# Altium PCB B-60-30-B.PcbDoc (part 1 of 3)
Units mm, origin at the board's own origin, x right, y up, seen from the top; angles counter-clockwise.
Board outline 70.1 x 39.1 mm, 6 copper layers (Top Layer, G1, S1, S2, G2, Bottom Layer), stack 2.011 mm thick; 241 components, 129 nets, 632 pads, 875 vias.
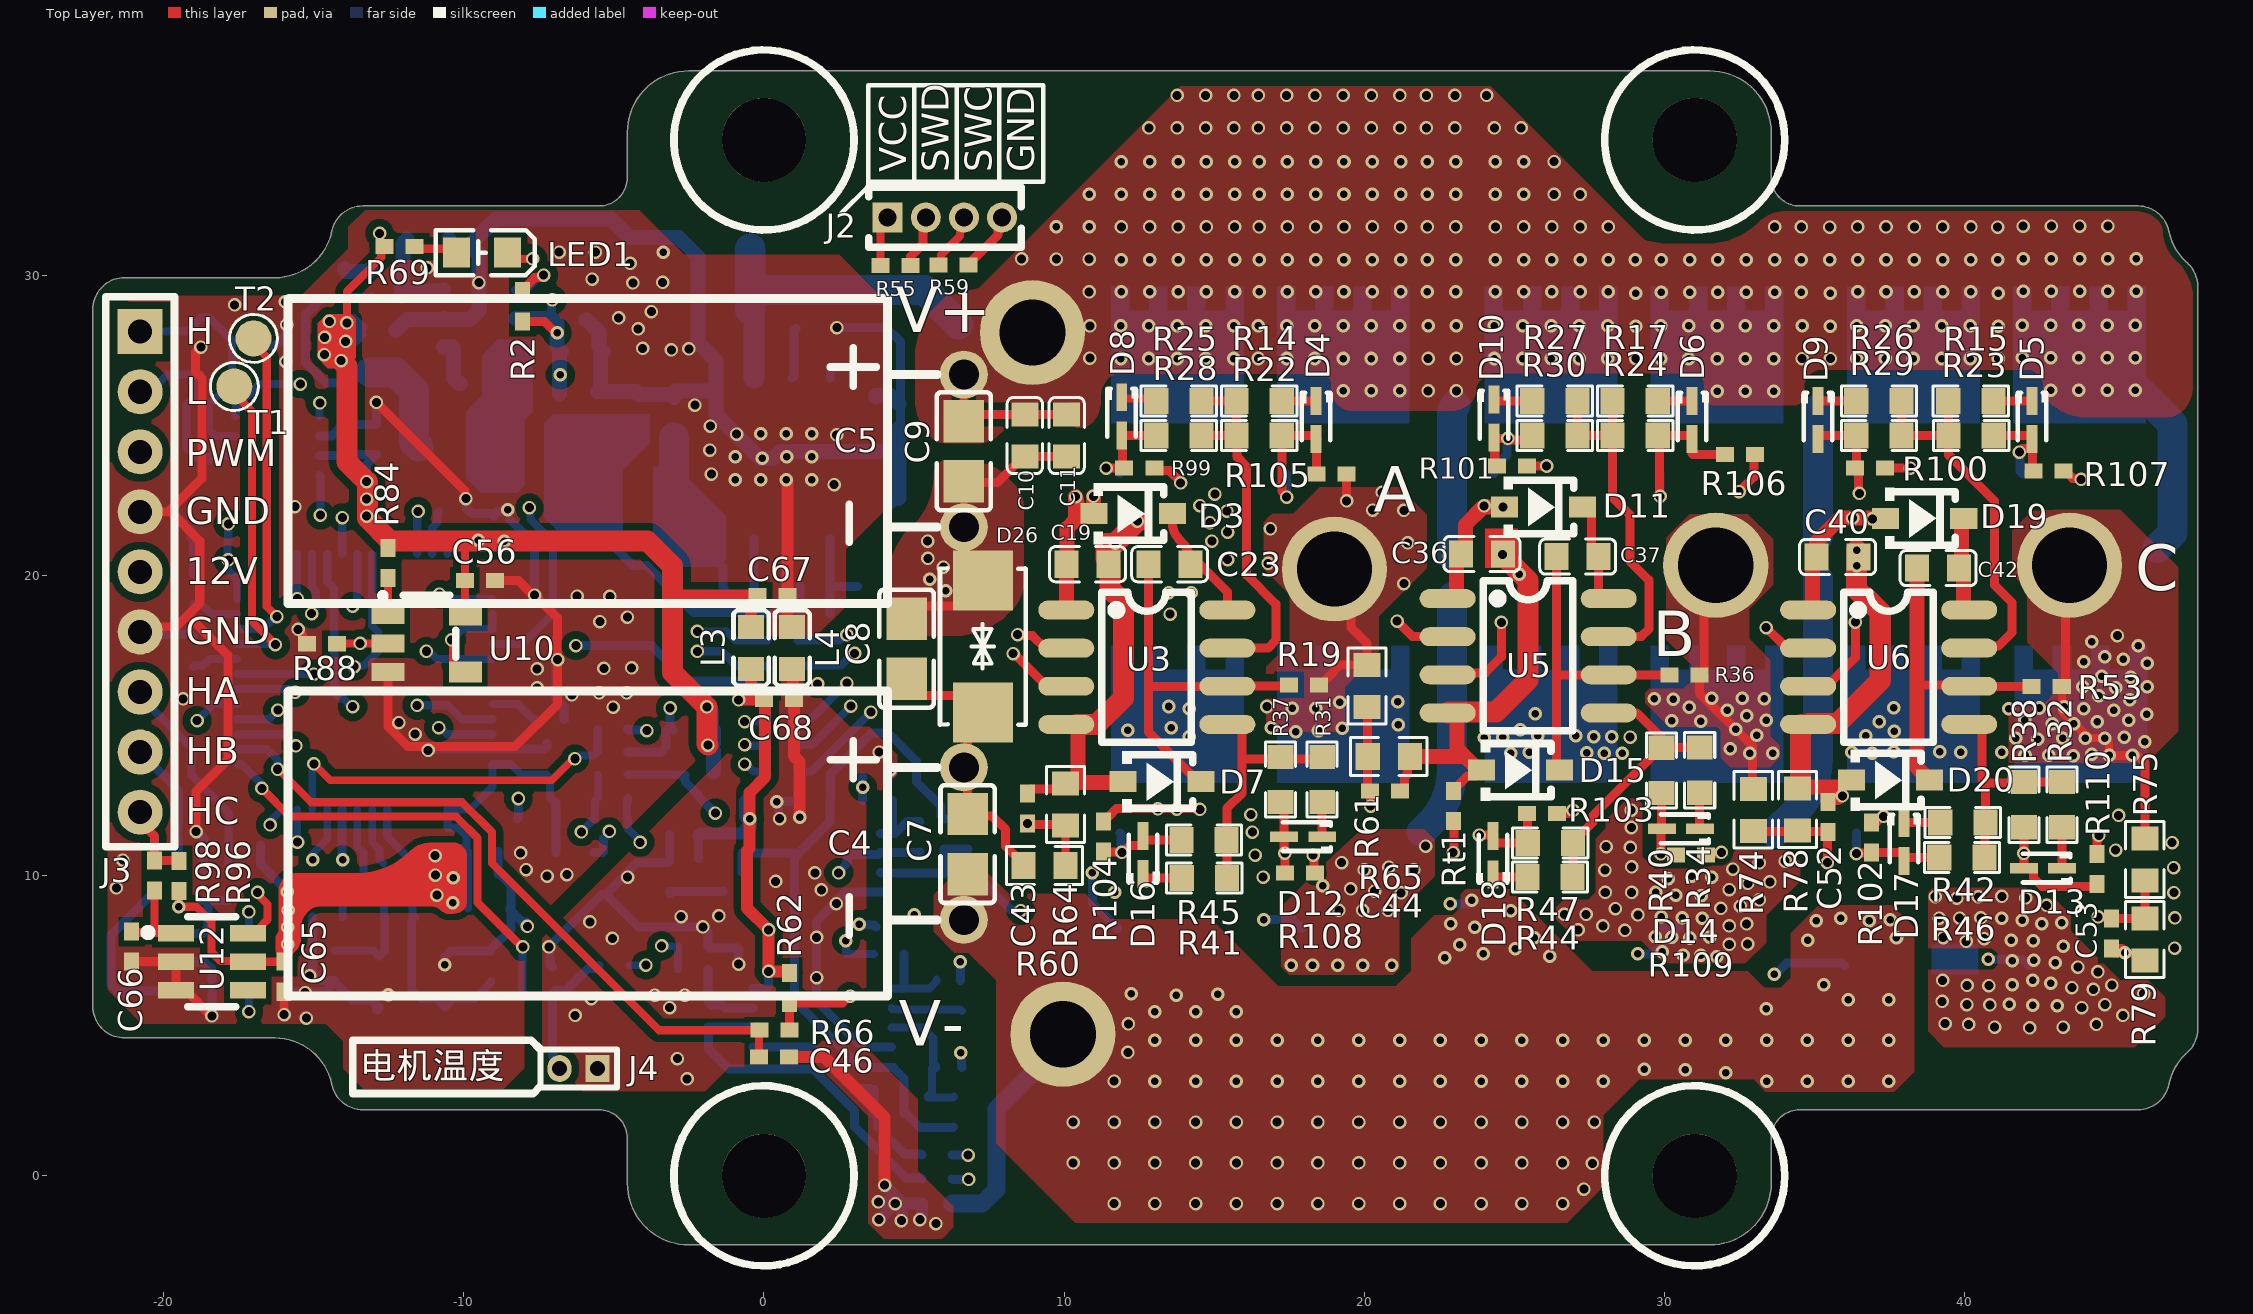
[diagram p0: Top Layer view]
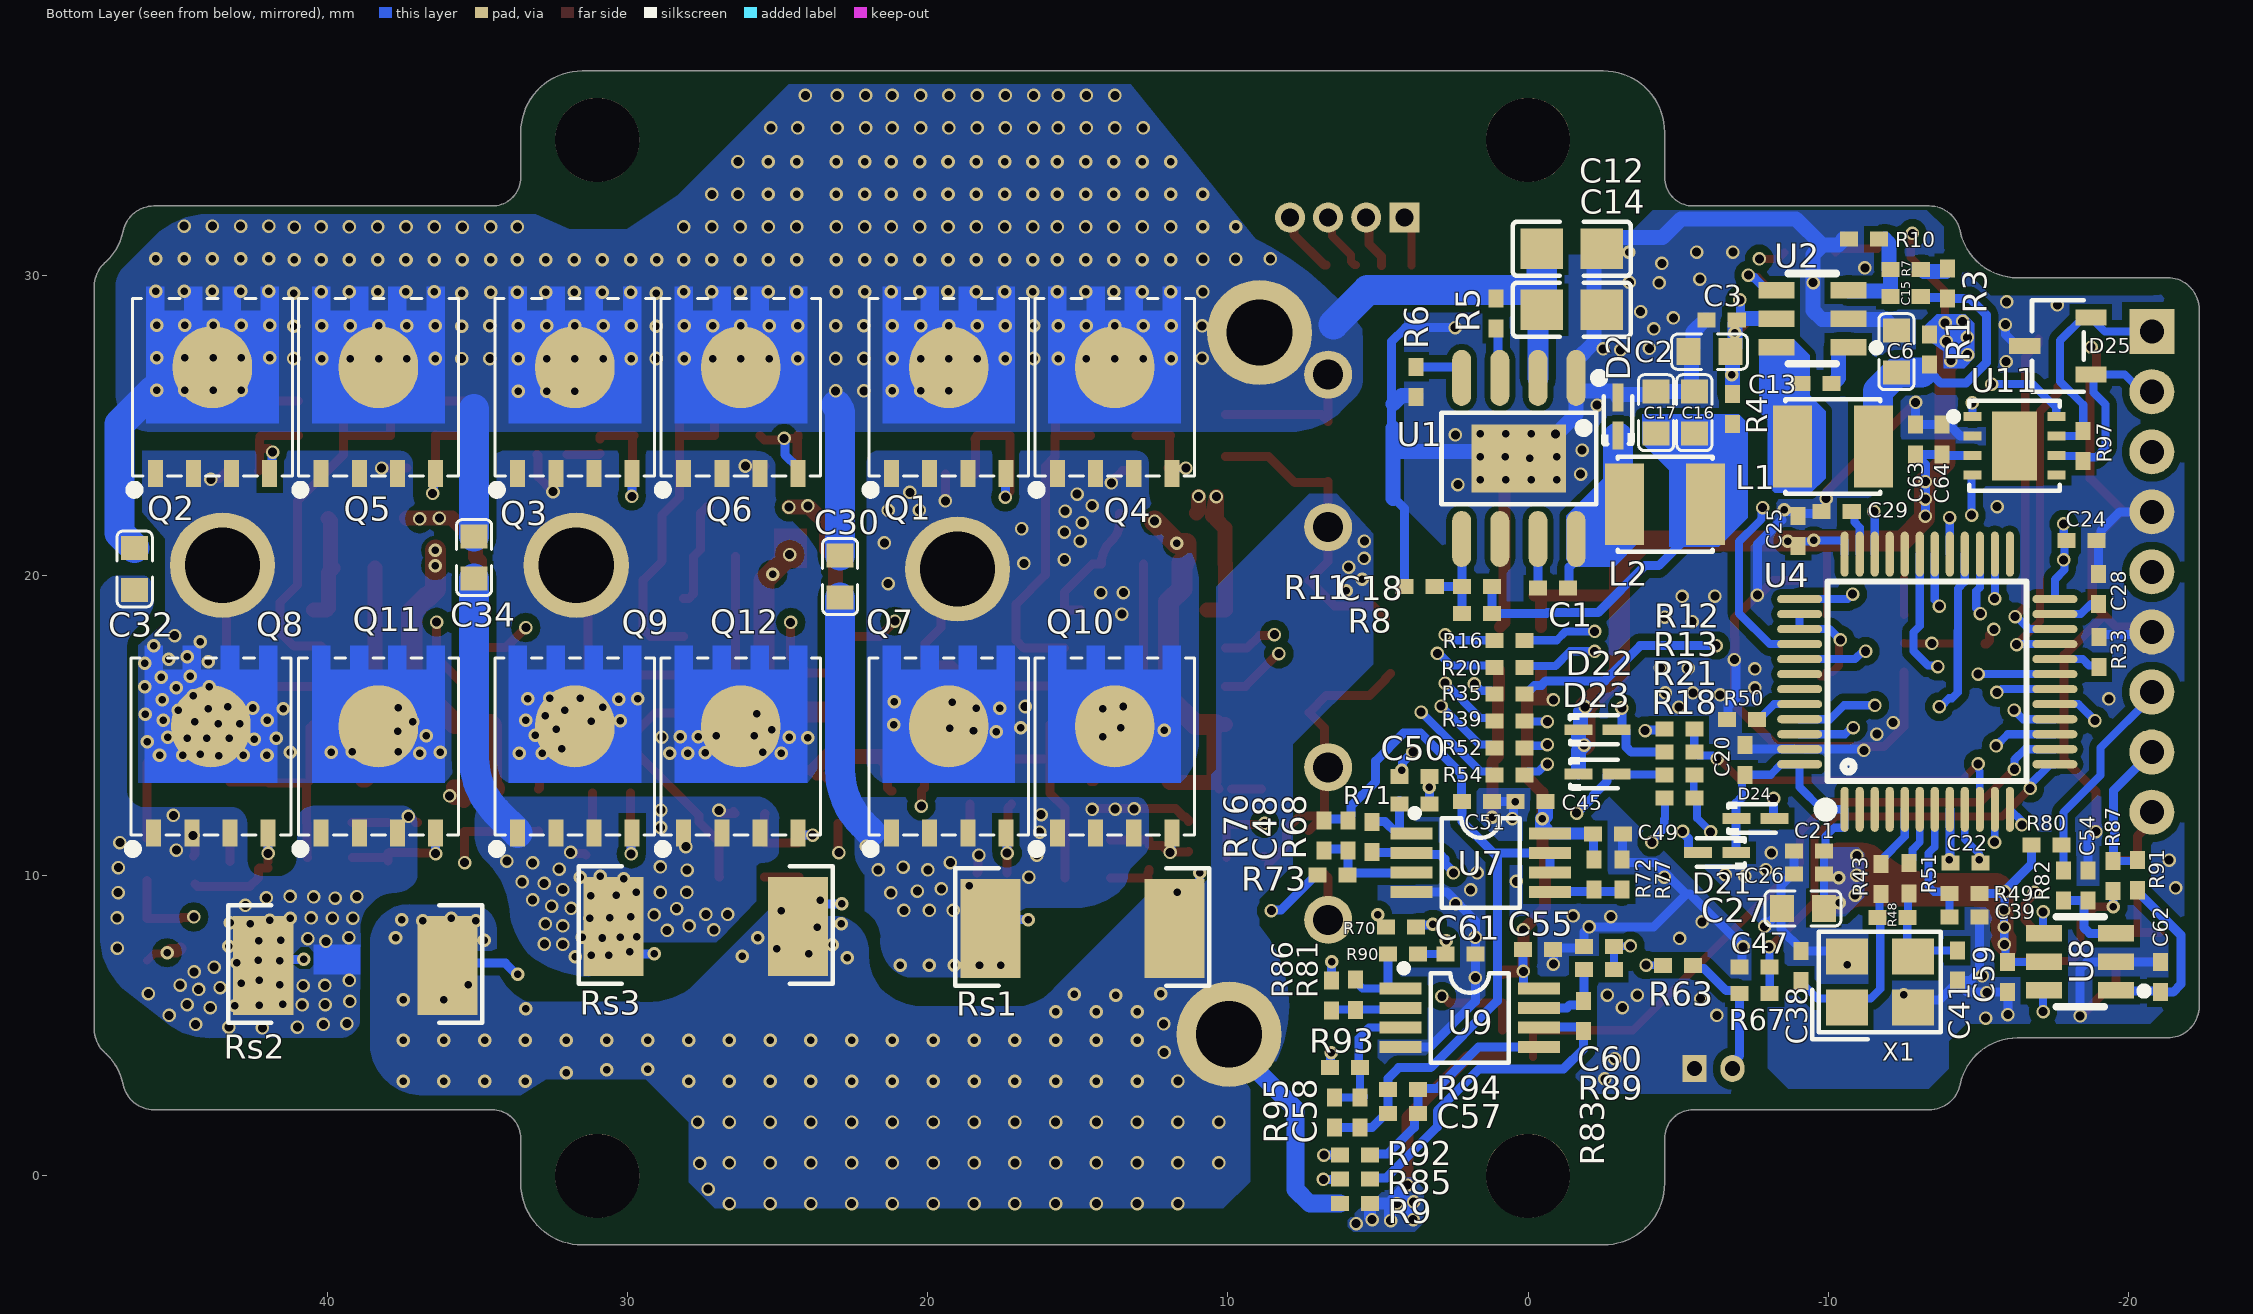
[diagram p1: Bottom Layer view, seen from below]
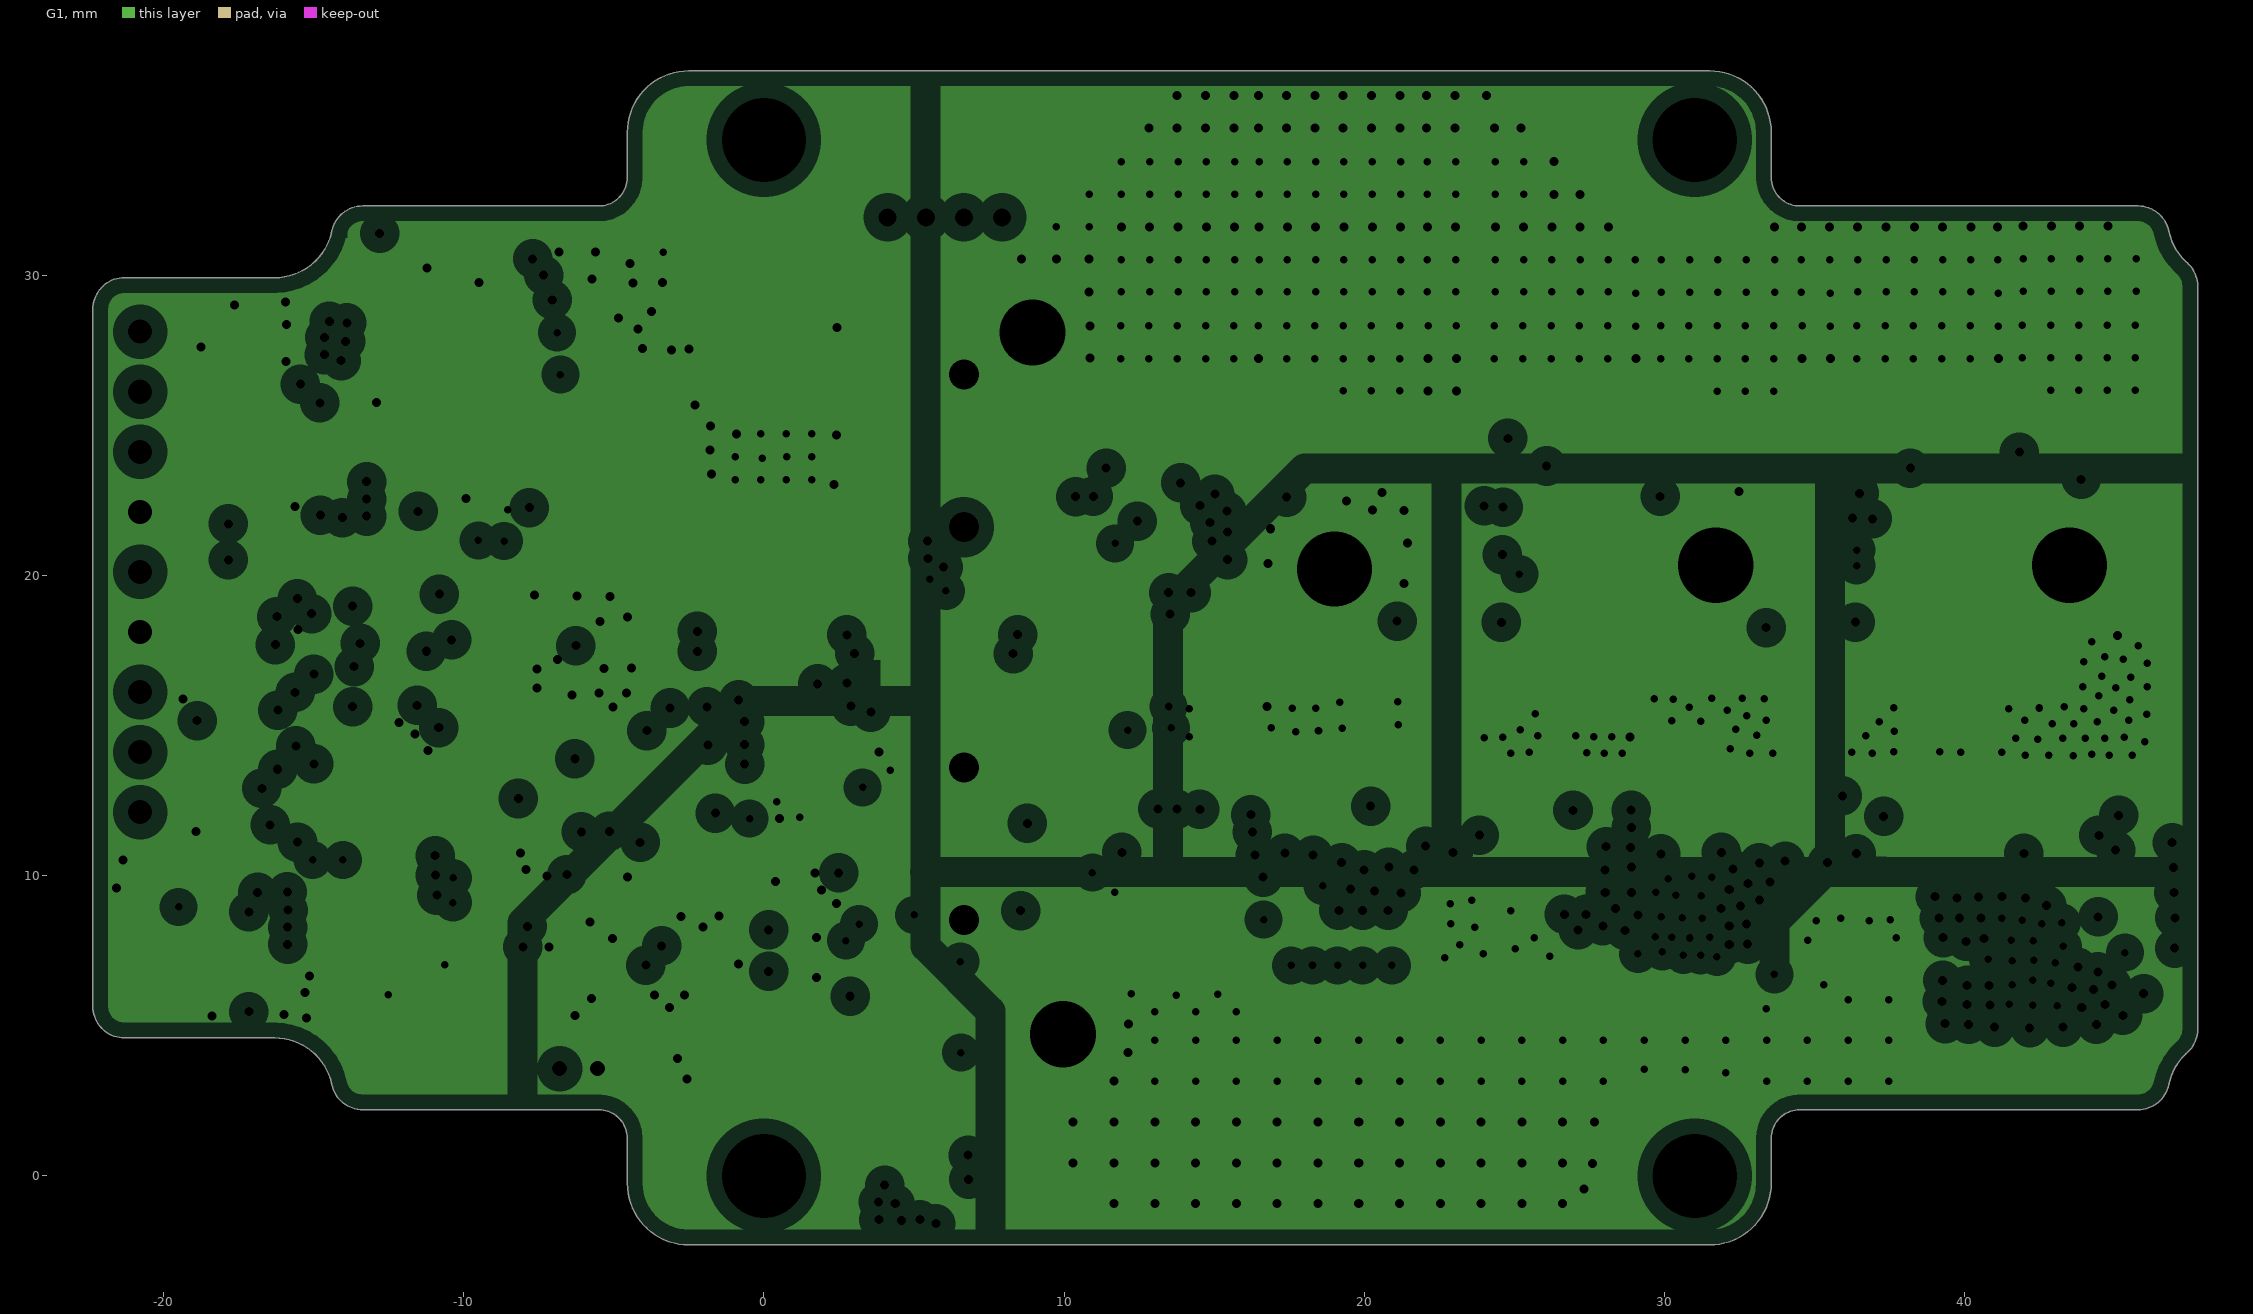
[diagram p2: G1, clearances drawn from the general rule]
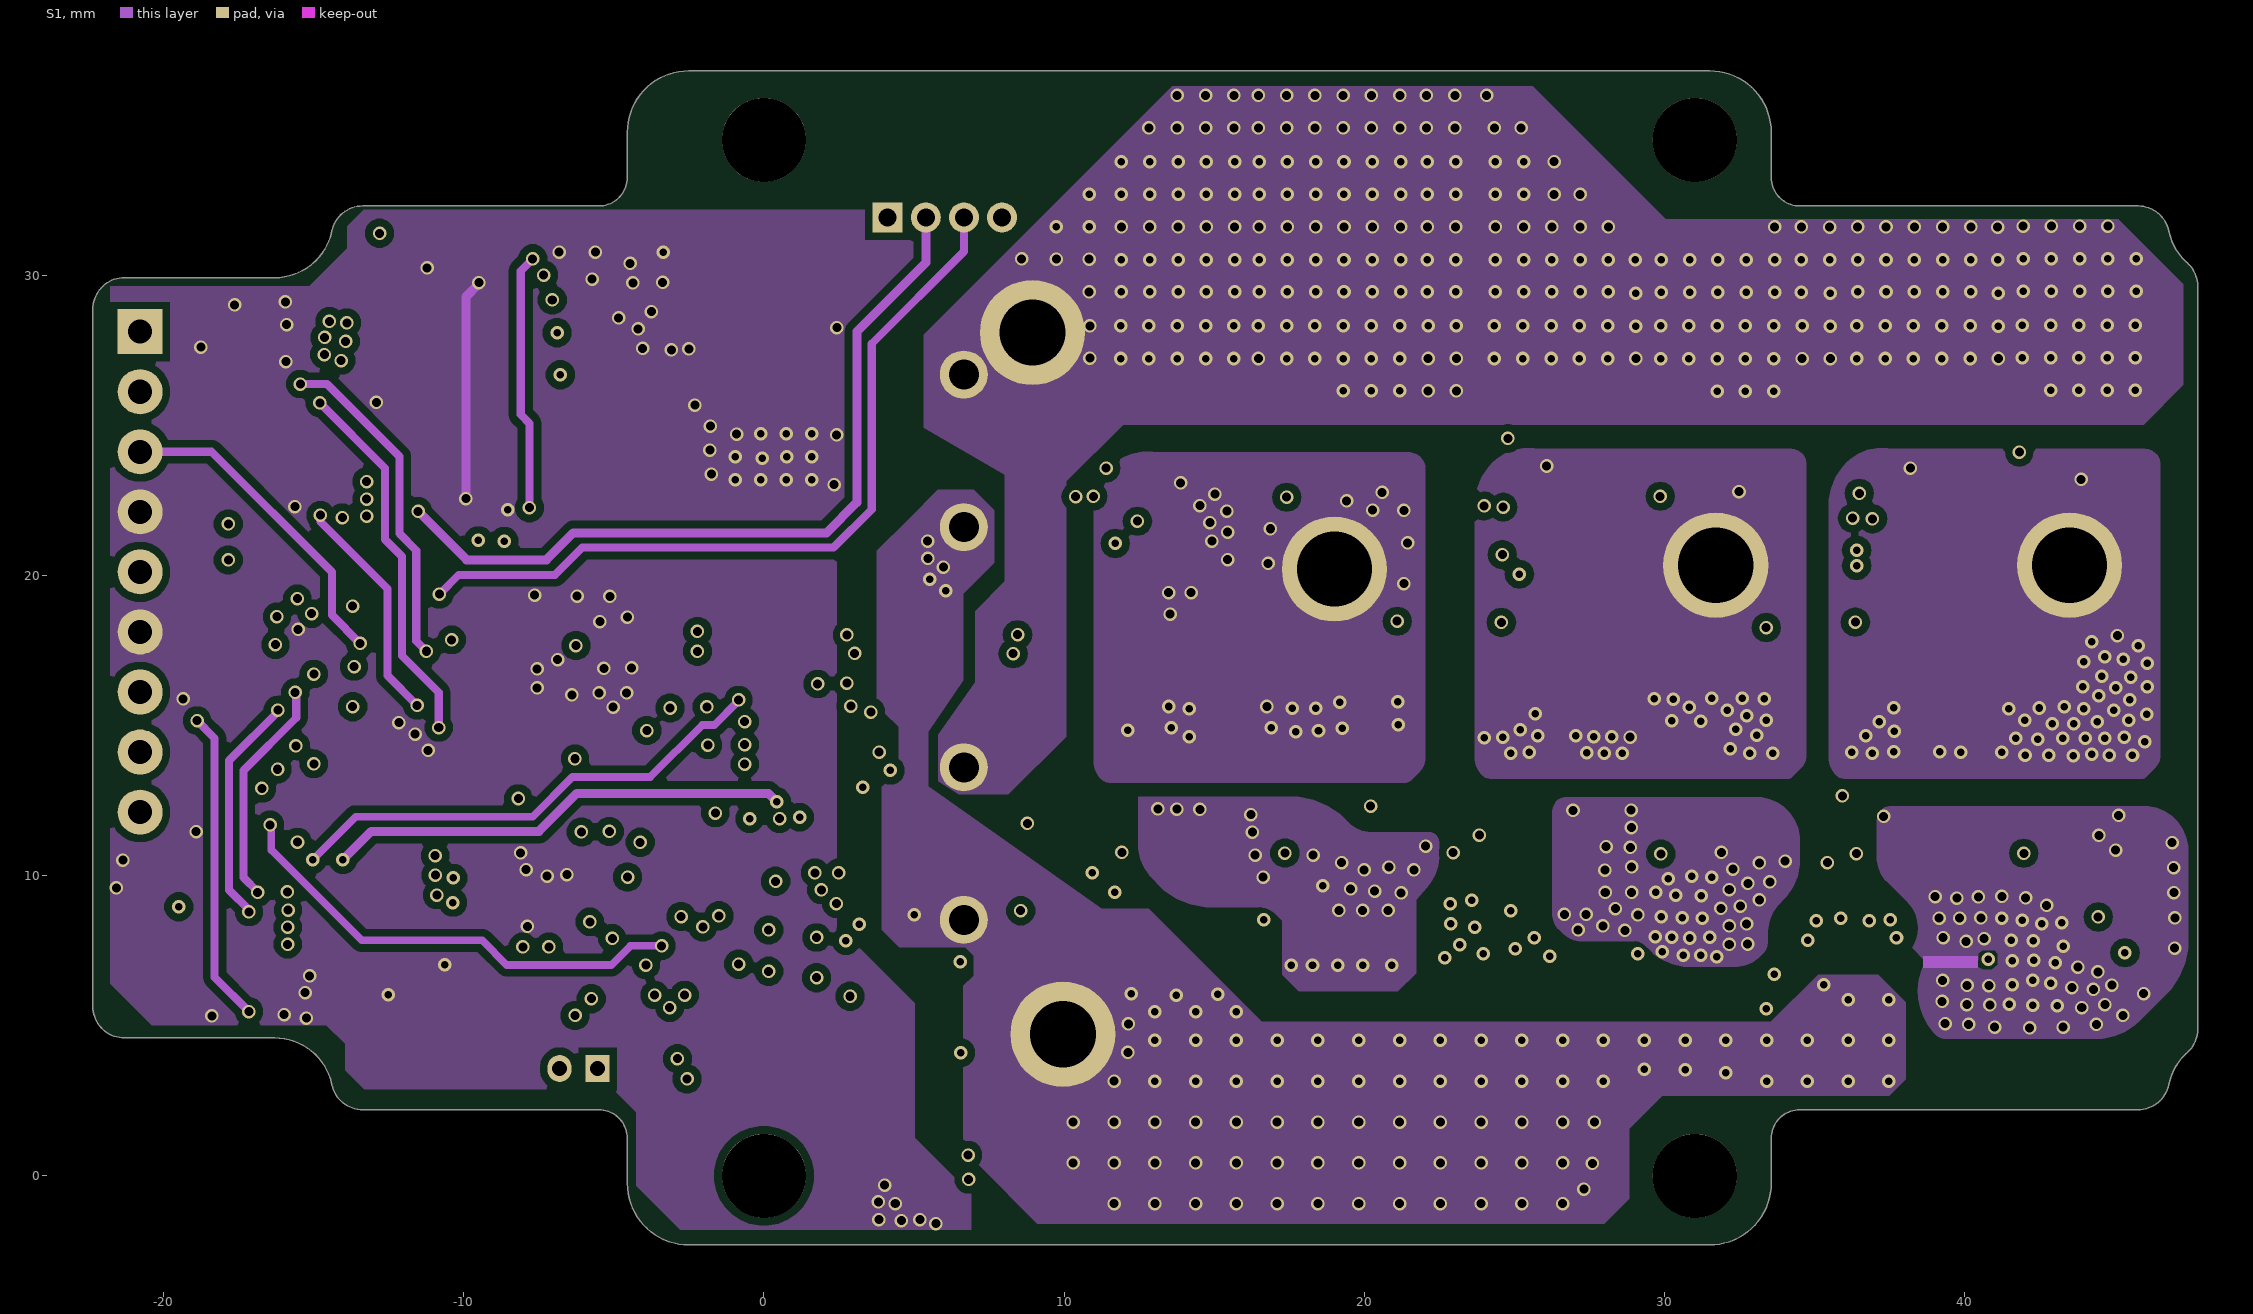
[diagram p3: S1]
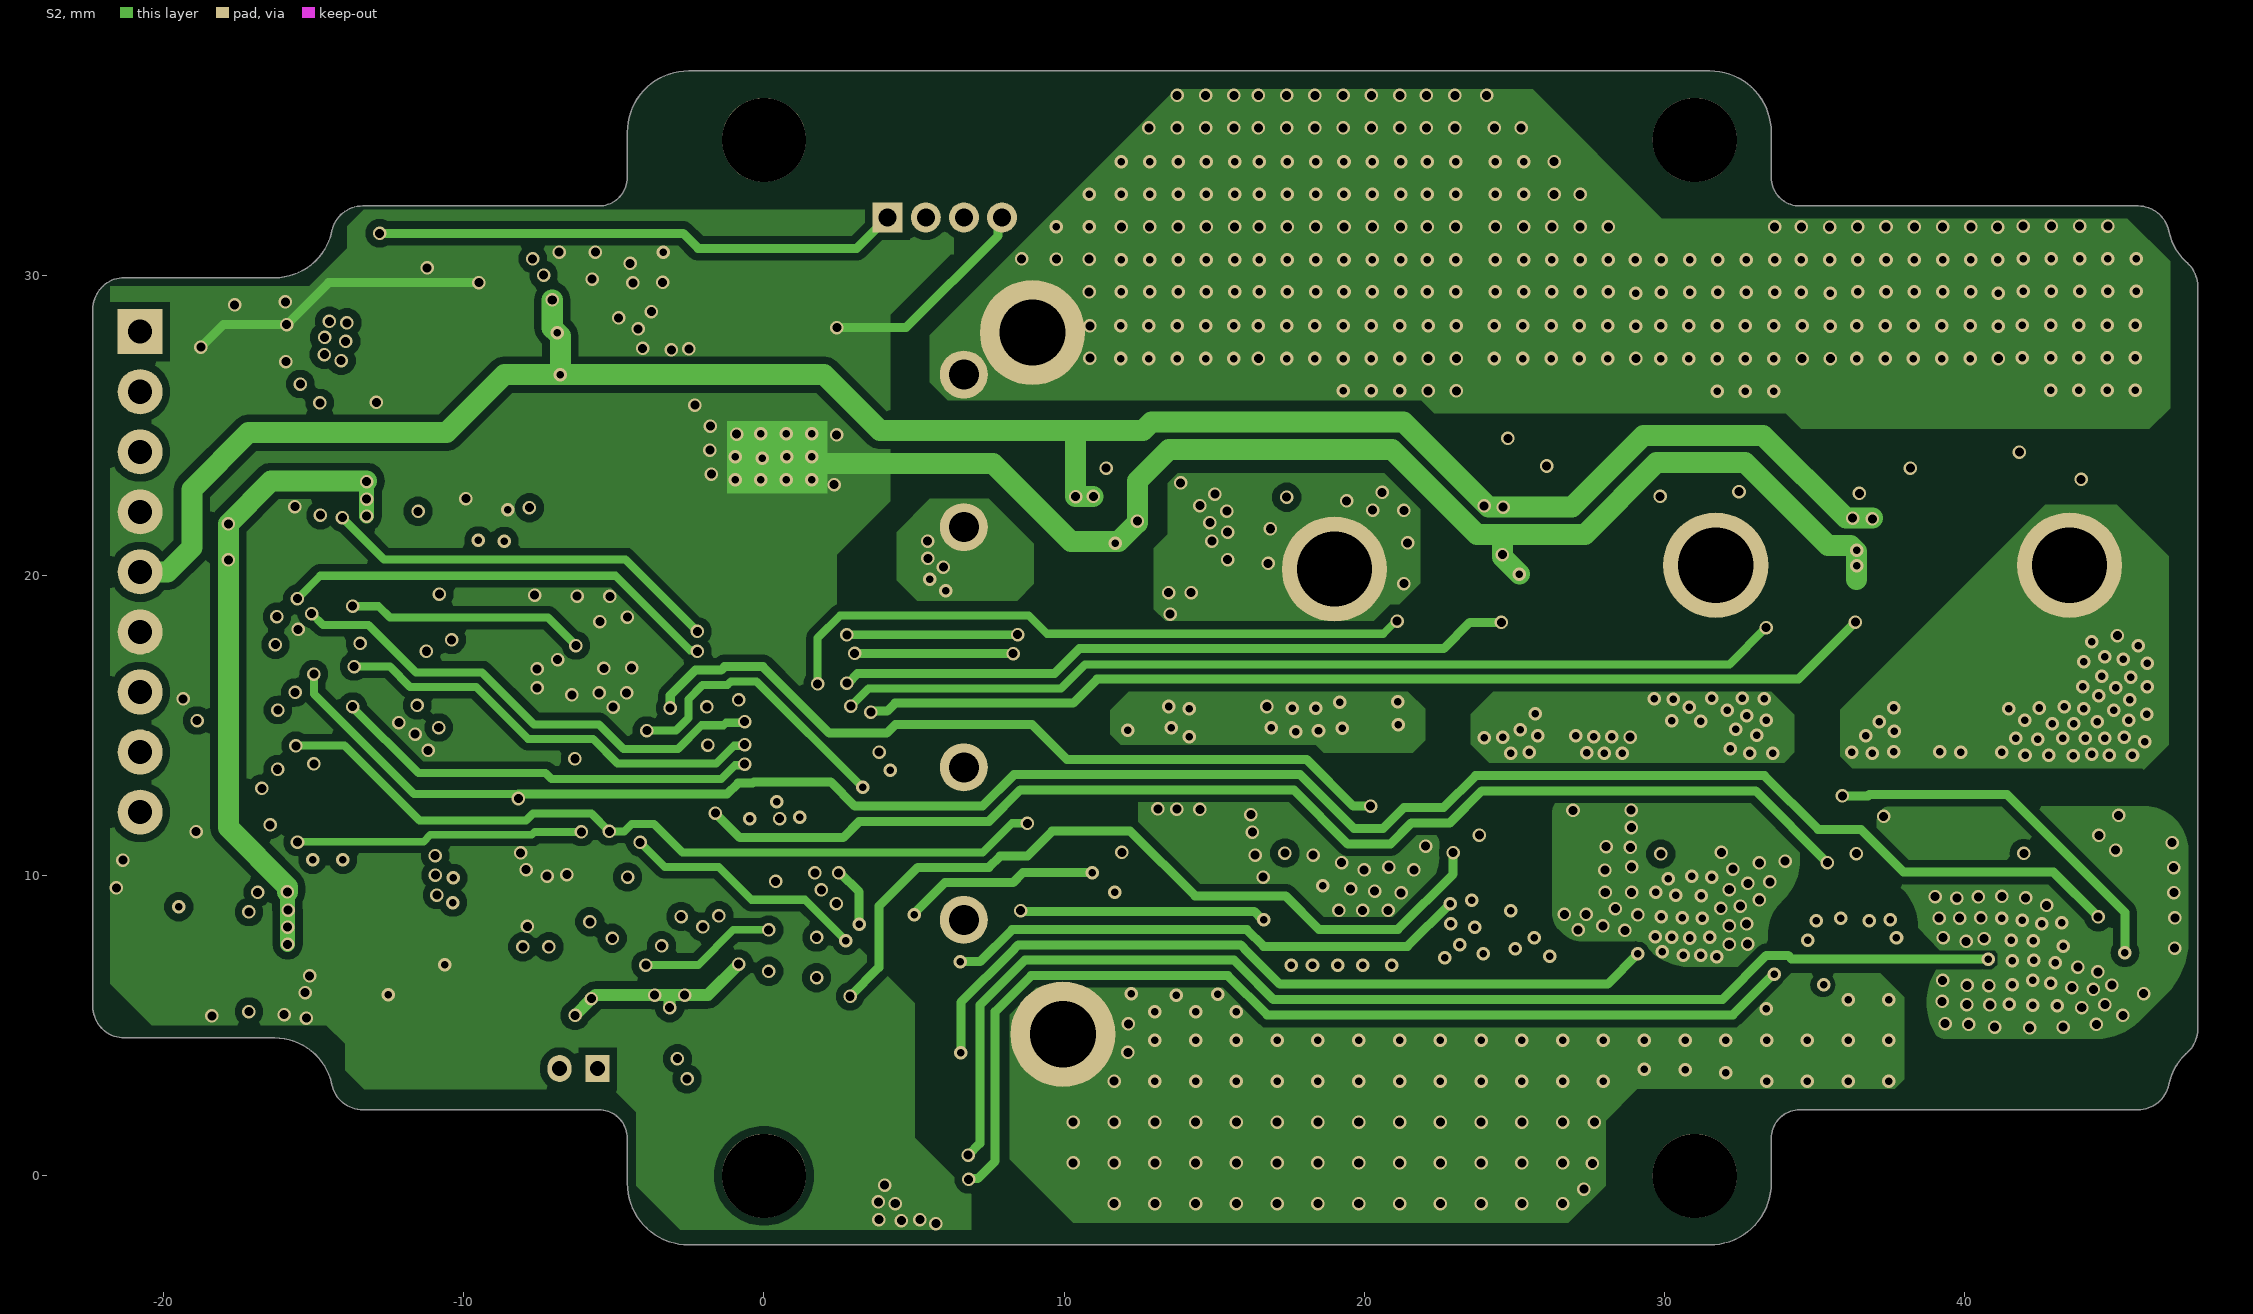
[diagram p4: S2]
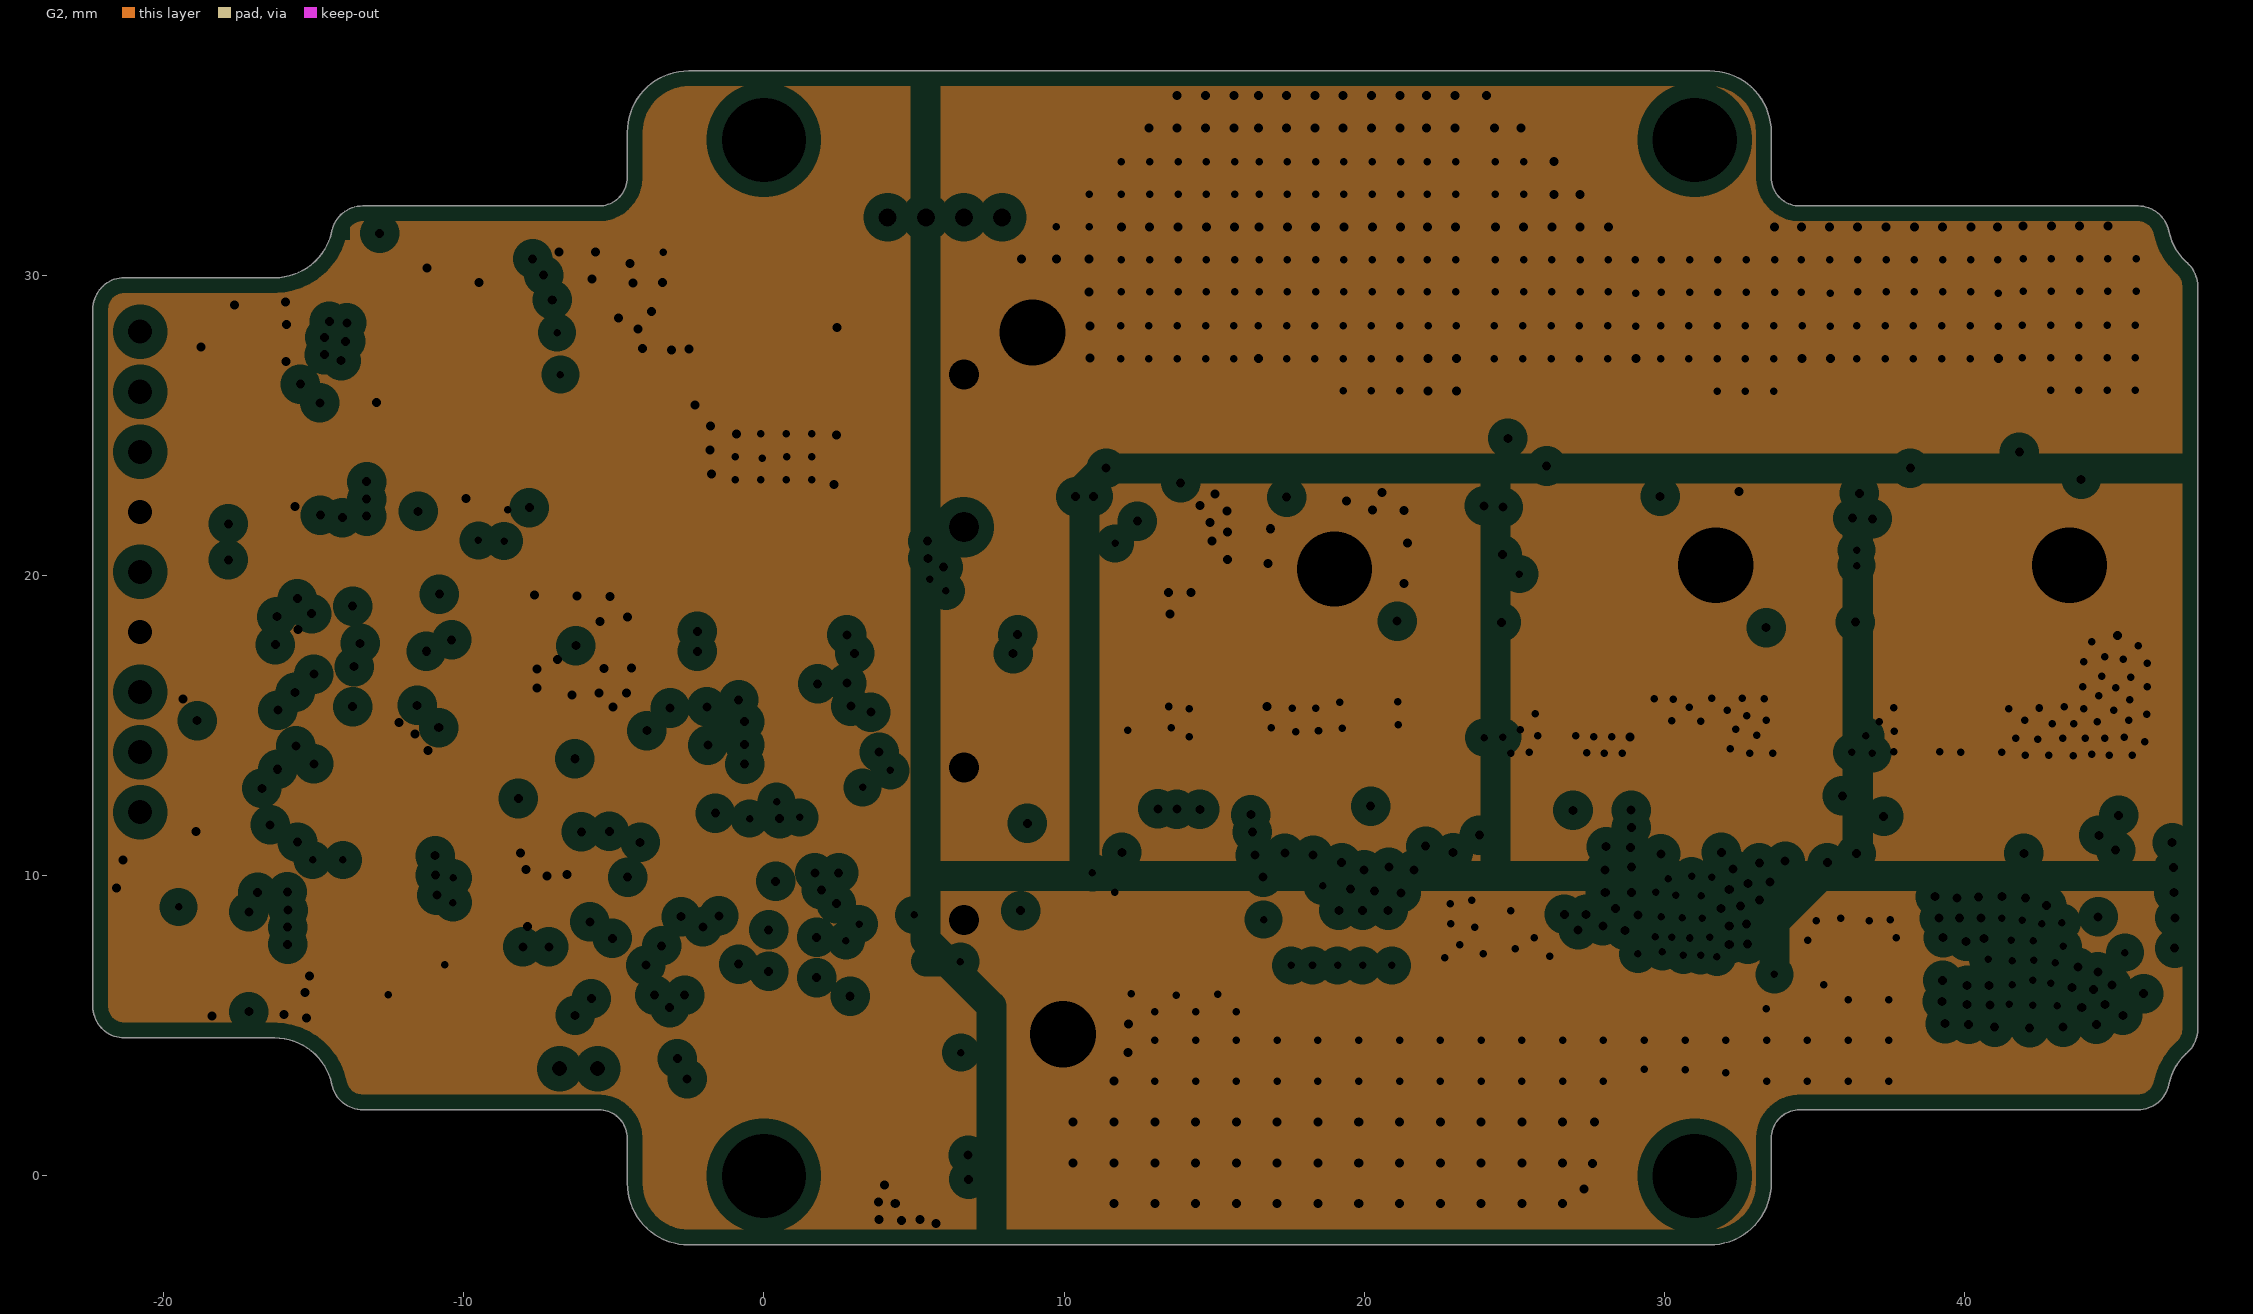
[diagram p5: G2, clearances drawn from the general rule]

## Layer stack, top to bottom
Top Solder: solder mask 0.0102, Solder Resist, Dk 3.5
Top Layer: signal copper 0.0356
Dielectric 2: prepreg 0.2, PP-006, Dk 4.1
G1: plane copper 0.035, net (Multiple Nets)
Dielectric 4: prepreg 0.3, PP-006, Dk 4.1
S1: signal copper 0.035
Dielectric 1: dielectric 0.8, FR-4, Dk 4.8
S2: signal copper 0.035
Dielectric 5: prepreg 0.3, PP-006, Dk 4.1
G2: plane copper 0.035, net (Multiple Nets)
Dielectric 3: prepreg 0.2, PP-006, Dk 4.1
Bottom Layer: signal copper 0.0356
Bottom Solder: solder mask 0.0102, Solder Resist, Dk 3.5

## Board outline
-21.3,4.593 -16.3,4.593 cw(c-16.3,2.642) -14.39,3.041 ccw(c-14.341,3.051) -14.388,3.032 ccw(c-13.362,3.248) -13.36,2.199 ccw(c-13.36,2.25) -13.356,2.2 -5.5,2.2 cw(c-5.5,1.25) -4.55,1.25 -4.55,-0.25 ccw(c-2.5,-0.25) -2.5,-2.3 ccw(c-2.5,-2.25) -2.499,-2.3 31.5,-2.3 ccw(c31.5,-0.25) 33.55,-0.25 33.55,1.25 cw(c34.5,1.25) 34.5,2.2 45.756,2.2 ccw(c45.76,2.25) 45.76,2.199 ccw(c45.762,3.248) 46.789,3.04 cw(c48.7,2.649) 47.353,4.059 ccw(c47.328,4.103) 47.36,4.064 ccw(c46.7,4.88) 47.749,4.87 ccw(c47.7,4.88) 47.75,4.88 47.75,29.628 ccw(c47.7,29.628) 47.749,29.638 ccw(c46.7,29.628) 47.36,30.444 ccw(c47.328,30.405) 47.358,30.445 cw(c48.7,31.861) 46.79,31.463 ccw(c45.763,31.251) 45.766,32.3 ccw(c45.762,32.25) 45.762,32.3 34.5,32.3 cw(c34.5,33.25) 33.55,33.25 33.55,34.75 ccw(c31.5,34.75) 31.5,36.8 -2.499,36.8 ccw(c-2.5,36.75) -2.5,36.8 ccw(c-2.5,34.75) -4.55,34.75 -4.55,33.25 cw(c-5.5,33.25) -5.5,32.3 ccw(c-5.5,32.25) -5.504,32.3 -13.362,32.3 ccw(c-13.363,31.251) -14.39,31.463 ccw(c-14.341,31.453) -14.39,31.463 ccw(c-16.3,31.861) -14.39,31.463 cw(c-16.3,31.861) -16.3,29.91 -21.3,29.91 ccw(c-21.3,28.86) -22.35,28.86 -22.35,5.644 ccw(c-21.3,5.644)

## Design rules (kind name [scope] priority, off if disabled: settings)
Clearance [All] p1: gap=0.254 ignorepadtopadclearanceinfootprint=TRUE except(0: Arc-Hole Track-Hole THPad-Hole Via-Hole Fill-Hole Poly-Hole Region-Hole Text-Hole; 0.2: Arc-SMDPad Track-SMDPad SMDPad-SMDPad SMDPad-THPad SMDPad-Via SMDPad-Fill SMDPad-Poly SMDPad-Text SMDPad-Hole Via-Via; 0.21: Arc-Arc Arc-Track Track-Track; 0.22: Arc-Region Track-Region SMDPad-Region THPad-Region Via-Region Fill-Region Poly-Region Region-Region)
ComponentClearance [All] p1: gap=0 collisioncheckmode=3 verticalgap=0 showdistances=FALSE
HoleSize [All] p1: absolutevalues=TRUE maxlimit=2.8 minlimit=0.025 maxpercent=80.000 minpercent=20.000
MinimumSolderMaskSliver [All] p1: minsoldermaskwidth=0
PlaneClearance [All] p1: clearance=0.508
PlaneConnect [All] p1: planeconnectstyle=Direct reliefexpansion=0.508 reliefentries=4 reliefconductorwidth=0.254 reliefairgap=0.254
PolygonConnect PolygonConnect_1 [InNet('GND') vs InNet('3V3')] p1: thpad.connectstyle=Relief thpad.reliefconductorwidth=0.4 thpad.reliefentries=4 thpad.polygonreliefangle="90 Angle" thpad.airgapwidth=0.254 smdpad.connectstyle=Relief smdpad.reliefconductorwidth=0.4 smdpad.reliefentries=4 smdpad.polygonreliefangle="90 Angle" smdpad.airgapwidth=0.254 via.connectstyle=Direct via.reliefconductorwidth=0.254 via.reliefentries=4 via.polygonreliefangle="90 Angle" via.airgapwidth=0.254
PolygonConnect [All] p2: connectstyle=Direct reliefconductorwidth=0.254 reliefentries=4 polygonreliefangle="90 Angle" airgapwidth=0.254
RoutingVias [All] p1: holewidth=0.3 width=0.45 viastyle="Through Hole" minholewidth=0.25 minwidth=0.45 maxholewidth=0.3 maxwidth=0.45
SilkToSilkClearance [All] p1: silktosilkclearance=0
SilkToSolderMaskClearance [IsPad] p1: minsilkscreentomaskgap=0 clearancetoexposedcopper=TRUE
SolderMaskExpansion [All] p1: expansion=0.102
Width [All] p1: maxlimit=1.5 minlimit=0.254 preferedwidth=0.3
23 further rules are at their usual default settings.

## Components (designator, comment, footprint, x,y, rotation, side; value= is the part's Value field where it differs from the comment)
A "THT_TEST_POINT" Hole-3MM#1 19.356,20.208 r0 top
B "THT_TEST_POINT" Hole-3MM#1 32.056,20.335 r0 top
C "THT_TEST_POINT" Hole-3MM#2 43.486,20.335 r0 top
C1 "103/50V/0402" 0402 -0.837,19.573 r0 bottom value=104/100V/0603
C2 "475/25V/0603" C0603 -6.044,27.447 r0 bottom value=0.1uF
C3 "104/50V/0402" 0402 -6.45,28.51 r0 bottom value=0.1uF
C4 "100uF/100V/10X12.5" CAP-TH_10X20 6.656,11.064 r270 top locked value=100uF
C5 "100uF/100V/10X12.5" CAP-TH_10X20 6.656,24.145 r270 top locked value=100uF
C6 "475/25V/0603" C0603 -12.267,27.447 r90 bottom value=0.1uF
C7 "475/100V/0805" C0805 6.783,10.048 r90 top value=475/100V/1210
C8 "475/100V/0805" C0805 4.751,18.557 r270 top value=475/100V/1210
C9 "475/100V/0805" C0805 6.656,23.129 r90 top value=475/100V/1210
C10 "104/100V/0603" C0603 8.688,24.653 r270 top value=226/25V/0805
C11 "104/100V/0603" C0603 10.085,24.653 r270 top value=226/25V/0805
C12 "475/100V/0805" C0805 -2.456,30.876 r0 bottom value=475/100V/1210
C13 "104/50V/0402" 0402 -9.61,26.39 r180 bottom value=104/100V/0603
C14 "475/100V/0805" C0805 -2.456,28.844 r0 bottom value=475/100V/1210
C15 "100pF/25V/0402" 0402 -12.578,29.288 r0 bottom value=106/25V/0603
C16 "106/25V/0603" C0603 -5.536,25.415 r90 bottom value=226/25V/0805
C17 "106/25V/0603" C0603 -4.266,25.415 r90 bottom value=226/25V/0805
C18 "100pF/25V/0402" 0402 1.703,19.62 r0 bottom value=106/25V/0603
C19 "106/25V/0603" C0603 10.782,20.368 r0 top value=226/25V/0805
C20 "104/50V/0402" 0402 -7.22,13.85 r270 bottom value=104/100V/0603
C21 "104/50V/0402" 0402 -9.354,10.81 r180 bottom value=104/100V/0603
C22 "104/50V/0402" 0402 -14.57,10.41 r0 bottom value=104/100V/0603
C23 "225/50V/0603" C0603 13.514,20.368 r180 top
C24 "104/50V/0402" 0402 -18.43,21.16 r180 bottom value=104/100V/0603
C25 "104/50V/0402" 0402 -8.992,21.478 r90 bottom value=104/100V/0603
C26 "104/50V/0402" 0402 -9.354,10.048 r0 bottom
C27 "106/25V/0603" C0603 -9.154,8.905 r0 bottom
C28 "475/10V/0402" 0402 -19,19.55 r90 bottom
C29 "475/10V/0402" 0402 -10.28,22.13 r0 bottom
C30 "103/100V/0603" C0603 22.912,19.954 r270 bottom value=226/25V/0805
C32 "103/100V/0603" C0603 46.407,20.208 r270 bottom value=226/25V/0805
C34 "103/100V/0603" C0603 35.104,20.589 r270 bottom value=226/25V/0805
C36 "106/25V/0603" C0603 23.91,20.71 r0 top value=226/25V/0805
C37 "225/50V/0603" C0603 27.103,20.622 r180 top
C38 "18pF/25V/0402" 0402 -9.092,6.992 r270 bottom value=106/25V/0603
C39 "475/10V/0402" 0402 -14.542,8.625 r0 bottom
C40 "106/25V/0603" C0603 35.76,20.61 r0 top value=226/25V/0805
C41 "18pF/25V/0402" 0402 -14.299,7 r90 bottom value=106/25V/0603
C42 "225/50V/0603" C0603 39.106,20.241 r180 top
C43 "103/50V/0402" 0402 8.776,12.24 r270 top
C44 "103/50V/0402" 0402 20.69,12.82 r180 top
C45 "225/16V/0402" 0402 -0.075,12.461 r0 bottom
C46 "103/50V/0402" 0402 0.338,3.96 r180 top
C47 "103/50V/0402" 0402 -7.548,6.956 r180 bottom
C48 "221/50V/0402" 0402 6,11.34 r270 bottom
C49 "104/50V/0402" 0402 -2.66,11.39 r180 bottom
C50 "221/50V/0402" 0402 3.79,13.3 r180 bottom
C51 "104/50V/0402" 0402 1.703,12.461 r180 bottom
C52 "103/50V/0402" 0402 35.44,11.95 r270 top
C53 "103/50V/0402" 0402 44.88,8.07 r90 top
C54 "221/50V/0402" 0402 -18.651,9.667 r90 bottom
C55 "225/16V/0402" 0402 -0.329,7.541 r180 bottom
C56 "104/50V/0402" 0402 -9.46,19.83 r0 top
C57 "221/50V/0402" 0402 4.17,2.08 r180 bottom
C58 "221/50V/0402" 0402 5.6,2.11 r90 bottom
C59 "225/16V/0402" 0402 -15.975,6.619 r270 bottom
C60 "221/50V/0402" 0402 -2.361,7.635 r180 bottom
C61 "221/50V/0402" 0402 2.253,7.381 r0 bottom
C62 "221/50V/0402" 0402 -21.055,6.619 r90 bottom
C63 "104/50V/0402" 0402 -12.902,24.524 r90 bottom
C64 "225/16V/0402" 0402 -13.791,24.524 r90 bottom
C65 "225/16V/0402" 0402 -15.98,6.63 r270 top
C66 "221/50V/0402" 0402 -21.055,7.635 r270 top
C67 "225/16V/0402" 0402 0.29,19.33 r0 top
C68 "225/16V/0402" 0402 0.5,15.86 r0 top
D2 "BAT46X" SOD-523 -2.996,25.923 r270 bottom
D3 "ES1JLWS" SOD-323_L1.6-W1.3-LS2.7-RD 12.3,22.05 r0 top
D4 "BAT46X" SOD-523 18.391,24.533 r90 top
D5 "BAT46X" SOD-523 42.229,24.533 r90 top
D6 "BAT46X" SOD-523 30.913,24.533 r90 top
D7 "ES1JLWS" SOD-323_L1.6-W1.3-LS2.7-RD 13.26,13.129 r0 top
D8 "BAT46X" SOD-523 11.914,24.66 r90 top
D9 "BAT46X" SOD-523 35.104,24.533 r90 top
D10 "BAT46X" SOD-523 24.31,24.59 r90 top
D11 "ES1JLWS" SOD-323_L1.6-W1.3-LS2.7-RD 25.96,22.273 r0 top
D12 "BAT46X" SOD-523 17.324,11.294 r0 top
D13 "BAT46X" SOD-523 41.965,10.245 r0 top
D14 "BAT46X" SOD-523 29.912,11.556 r0 top
D15 "ES1JLWS" SOD-323_L1.6-W1.3-LS2.7-RD 25.198,13.51 r0 top
D16 "BAT46X" SOD-523 12.625,11.318 r270 top
D17 "BAT46X" SOD-523 37.97,10.48 r90 top
D18 "BAT46X" SOD-523 24.28,11.31 r270 top
D19 "ES1JLWS" SOD-323_L1.6-W1.3-LS2.7-RD 38.66,21.892 r0 top
D20 "ES1JLWS" SOD-323_L1.6-W1.3-LS2.7-RD 37.52,13.18 r0 top
D21 "BAT46X" SOD-523 -5.663,10.764 r180 bottom
D22 "BAT46X" SOD-523 -2.947,14.855 r0 bottom
D23 "BAT46X" SOD-523 -2.95,13.38 r0 bottom
D24 "BAT46X" SOD-523 -8.21,11.9 r0 bottom
D25 "PSM712" SOT-23-3_L3.0-W1.7-P0.95-LS2.9-BR -17.643,27.635 r180 bottom
D26 "SMAJ78CA" SMA 7.291,19.827 r270 top
J2 "Header 4" HDR-TH_4P-P1.27-V-M 6.025,31.92 r0 top
J3 "Header 9" HDR-TH_9P-P2.00-V-M -20.776,20.113 r270 top
J4 "温度检测" SIP-2-1.27 -5.536,3.571 r180 top
L1 "PNLS3012-330M" SMD3×3×1.3 -11.5,24.29 r0 bottom value=33uH/3*3*1.2
L2 "PNLS3012-101M" SMD3×3×1.3 -5.917,22.367 r0 bottom value=100uH/3*3*1.2
L3 "CBG160808U000T" L0603 -0.43,17.58 r270 top
L4 "CBG160808U000T" L0603 0.94,17.58 r270 top
LED1 "GREEN" LED0603-FD -9.385,30.749 r0 top
Q1 "LSGN10R047" DFN5×6 19.295,26.933 r180 bottom
Q2 "LSGN10R047" DFN5×6 43.816,26.933 r180 bottom
Q3 "LSGN10R047" DFN5×6 31.746,26.933 r180 bottom
Q4 "LSGN10R047" DFN5×6 13.768,26.933 r180 bottom
Q5 "LSGN10R047" DFN5×6 38.289,26.933 r180 bottom
Q6 "LSGN10R047" DFN5×6 26.219,26.933 r180 bottom
Q7 "LSGN10R047" DFN5×6 19.295,14.971 r180 bottom
Q8 "LSGN10R047" DFN5×6 43.867,14.971 r180 bottom
Q9 "LSGN10R047" DFN5×6 31.746,14.971 r180 bottom
Q10 "LSGN10R047" DFN5×6 13.768,14.971 r180 bottom
Q11 "LSGN10R047" DFN5×6 38.289,14.971 r180 bottom
Q12 "LSGN10R047" DFN5×6 26.219,14.971 r180 bottom
R1 "0Ω/0402" 0402 -13.37,27.52 r90 bottom
R2 "100K/0402" 0402 -8.04,28.96 r90 top
R3 "62K/0402" 0402 -13.97,29.72 r90 bottom
R4 "0Ω/0402" 0402 -6.806,25.542 r270 bottom
R5 "100K/0402" 0402 1.068,28.717 r270 bottom
R6 "510K/0402" 0402 3.74,26.44 r90 bottom
R7 "100Ω/0402" 0402 -12.578,30.177 r0 bottom
R8 "280K/0402" 0402 1.703,18.725 r180 bottom
R9 "0Ω/0402" 0402 5.77,-0.93 r0 bottom
R10 "20K/0402" 0402 -11.181,31.193 r0 bottom
R11 "20K/0402" 0402 3.608,19.62 r180 bottom
R12 "0Ω/0402" 0402 -5.036,14.874 r0 bottom
R13 "0Ω/0402" 0402 -5.036,14.112 r0 bottom
R14 "10Ω/0603" R0603 16.495,25.803 r0 top
R15 "10Ω/0603" R0603 40.197,25.803 r0 top
R16 "300Ω/0402" 0402 0.623,17.83 r180 bottom
R17 "10Ω/0603" R0603 29.017,25.803 r0 top
R18 "0Ω/0402" 0402 -5.036,12.588 r0 bottom
R19 "4.7Ω/0402" 0402 17.99,16.35 r180 top
R20 "300Ω/0402" 0402 0.623,16.935 r180 bottom
R21 "0Ω/0402" 0402 -5.036,13.35 r0 bottom
R22 "10Ω/0603" R0603 16.495,24.66 r0 top
R23 "10Ω/0603" R0603 40.206,24.66 r0 top
R24 "10Ω/0603" R0603 29.017,24.66 r0 top
R25 "10Ω/0603" R0603 13.819,25.803 r180 top
R26 "10Ω/0603" R0603 37.136,25.803 r180 top
R27 "10Ω/0603" R0603 26.341,25.803 r180 top
R28 "10Ω/0603" R0603 13.819,24.66 r180 top
R29 "10Ω/0603" R0603 37.136,24.66 r180 top
R30 "10Ω/0603" R0603 26.341,24.66 r180 top
R31 "10Ω/0603" R0603 18.594,13.199 r270 top
R32 "10Ω/0603" R0603 43.232,12.358 r270 top
R33 "10K/0402" 0402 -19.01,17.44 r90 bottom
R34 "10Ω/0603" R0603 31.167,13.51 r270 top
R35 "300Ω/0402" 0402 0.623,16.041 r180 bottom
R36 "4.7Ω/0402" 0402 30.659,16.685 r180 top
R37 "10Ω/0603" R0603 17.197,13.199 r270 top
R38 "10Ω/0603" R0603 41.962,12.358 r270 top
R39 "300Ω/0402" 0402 0.623,15.146 r180 bottom
R40 "10Ω/0603" R0603 29.897,13.501 r270 top
R41 "10Ω/0603" R0603 14.666,9.921 r180 top
R42 "10Ω/0603" R0603 39.93,11.77 r180 top
R43 "10Ω/0402" 0402 -11.75,9.89 r270 bottom
R44 "10Ω/0603" R0603 26.18,9.95 r180 top
R45 "10Ω/0603" R0603 14.657,11.191 r180 top
R46 "10Ω/0603" R0603 39.9,10.6 r180 top
R47 "10Ω/0603" R0603 26.19,11.08 r180 top
R48 "1M/0402" 0402 -12.13,8.61 r180 bottom
R49 "1K/0402" 0402 -14.542,9.398 r0 bottom
R50 "10K/0402" 0402 -7.12,15.19 r0 bottom
R51 "10Ω/0402" 0402 -12.68,9.91 r270 bottom
R52 "300Ω/0402" 0402 0.623,14.251 r180 bottom
R53 "4.7Ω/0402" 0402 42.724,16.304 r180 top
R54 "300Ω/0402" 0402 0.623,13.356 r180 bottom
R55 "10K/0402" 0402 4.38,30.32 r180 top
R59 "10K/0402" 0402 6.32,30.33 r0 top
R60 "10K/0603" 0603 9.346,10.335 r180 top
R61 "10K/0603" 0603 20.08,16.31 r90 top
R62 "2K/0402" 0402 0.85,6.26 r270 top
R63 "2K/0402" 0402 -4.99,7.01 r180 bottom
R64 "330Ω/0603" 0603 10.046,12.367 r270 top
R65 "330Ω/0603" 0603 20.81,13.97 r180 top
R66 "2K/0402" 0402 0.346,4.849 r180 top
R67 "2K/0402" 0402 -7.548,6.067 r180 bottom
R68 "10K/0402" 0402 5.2,11.28 r90 bottom
R69 "10K/0402" 0402 -12.13,30.95 r180 top
R70 "1k-0402" 0402 4.23,8.28 r180 bottom
R71 "100Ω/0402" 0402 3.78,12.39 r180 bottom
R72 "10K/0402" 0402 -2.2,10.04 r270 bottom
R73 "1k-0402" 0402 6.51,10.02 r180 bottom
R74 "10K/0603" 0603 32.95,12.19 r90 top
R75 "10K/0603" 0603 45.99,10.537 r90 top
R76 "10K/0402" 0402 6.8,11.34 r270 bottom
R77 "10K/0402" 0402 -3.13,10.04 r90 bottom
R78 "330Ω/0603" 0603 34.42,12.2 r270 top
R79 "330Ω/0603" 0603 45.99,7.87 r90 top
R80 "1K/0402" 0402 -17.26,11.01 r0 bottom
R81 "10K/0402" 0402 5.75,6.03 r90 bottom
R82 "300Ω/0402" 0402 -17.826,9.667 r90 bottom
R83 "10K/0402" 0402 -1.85,5.32 r90 bottom
R84 "1K/0402" 0402 -12.52,20.41 r90 top
R85 "1k-0402" 0402 5.77,-0.1 r180 bottom
R86 "1k-0402" 0402 6.54,6.01 r270 bottom
R87 "1K/0402" 0402 -19.475,9.987 r90 bottom
R88 "10K/0402" 0402 -14.72,17.72 r180 top
R89 "100Ω/0402" 0402 -2.361,6.873 r180 bottom
R90 "100Ω/0402" 0402 4.158,7.381 r0 bottom
R91 "300Ω/0402" 0402 -20.3,10.01 r90 bottom
R92 "1k-0402" 0402 5.77,0.69 r180 bottom
R93 "1k-0402" 0402 6.1,3.6 r180 bottom
R94 "10K/0402" 0402 4.17,2.88 r180 bottom
R95 "10K/0402" 0402 6.45,2.11 r90 bottom
R96 "1K/0402" 0402 -19.48,9.99 r90 top
R97 "120Ω/0402" 0402 -18.49,24.31 r90 bottom
R98 "300Ω/0402" 0402 -20.293,10 r90 top
R99 "10K/0402" 0402 12.5,23.57 r0 top
R100 "10K/0402" 0402 36.83,23.58 r0 top
R101 "10K/0402" 0402 24.91,23.64 r0 top
R102 "10K/0402" 0402 36.88,11.27 r90 top
R103 "10K/0402" 0402 25.91,12.06 r0 top
R104 "10K/0402" 0402 11.31,11.3 r90 top
R105 "10K/0402" 0402 18.91,23.38 r180 top
R106 "10K/0402" 0402 32.51,24.02 r0 top
R107 "10K/0402" 0402 42.78,23.48 r0 top
R108 "10K/0402" 0402 17.85,10.08 r0 top
R109 "10K/0402" 0402 30.88,10.69 r0 top
R110 "10K/0402" 0402 44.39,10.22 r90 top
Rs1 "EBWM2512F1L00S9：1mΩ" R2512 17.91,8.24 r180 bottom value=0.02Ω
Rs2 "EBWM2512F1L00S9：1mΩ" R2512 42.126,7 r180 bottom value=0.02Ω
Rs3 "EBWM2512F1L00S9：1mΩ" R2512 30.453,8.3 r180 bottom value=0.02Ω
Rt1 "PT1000" 0402 22.97,12.31 r270 top value=10K
T1 "THT_TEST_POINT" test -17.64,26.29 r0 top
T2 "THT_TEST_POINT" test -17,27.89 r0 top
U1 "SCT2A10ASTER" ESOP-8 -1.599,26.574 r0 bottom
U2 "SCT2401" TSOT-23-6_L2.9-W1.6-P0.95-LS2.8-BL -9.47,28.55 r90 bottom
U3 "G2022" SOP-8_L4.9-W3.9-P1.27-LS6.0-BL 12.752,16.939 r270 top
U4 "AT32F403ACGT7" LQFP-48_L7.0-W7.0-P0.50-LS9.0-BL -13.295,16.457 r180 bottom locked
U5 "G2022" SOP-8_L4.9-W3.9-P1.27-LS6.0-BL 25.452,17.32 r270 top
U6 "G2022" SOP-8_L4.9-W3.9-P1.27-LS6.0-BL 37.46,16.94 r270 top
U7 "LMV358IDGKRG" MSOP8 1.703,10.175 r270 bottom
U8 "74LVC2G14GV" TSOT-23-6_L2.9-W1.6-P0.95-LS2.8-BL -18.388,7.127 r90 bottom
U9 "LMV358IDGKRG" MSOP8 2.07,5.009 r270 bottom
U10 "SN74LVC1G08DBVR" SOT-23-5 -12.528,18.682 r180 top
U11 "SIT3051TK" HVSON8 -16.201,24.313 r270 bottom
U12 "74LVC2G14GV" TSOT-23-6_L2.9-W1.6-P0.95-LS2.8-BL -18.388,7.127 r270 top
V+ "THT_TEST_POINT" Hole-2.2MM 8.942,28.082 r0 top
V- "THT_TEST_POINT" Hole-2.2MM 9.958,4.714 r0 top
X1 "12MHz" CRYSTAL-SMD_4P-L3.2-W2.5-BL -11.716,6.453 r180 bottom

## Footprints (in the part's own frame and the unit in brackets; to place one, negate y for a bottom-side part, rotate by r counter-clockwise, add the part's x,y. Pads: shape width x height; smd on the part's side, far side on the other; paste and mask are expansions set on the pad)
0402 [mm]
  rect 0.6x0.5 smd: 1(-0.5,0) 2(0.5,0)
  body extent -0.55,-0.3 0.55,0.3, height 1.3
0603 [mm] "Chip Inductor, Body 0.6x0.3mm, IPC High Density"
  rect 0.8x0.9 smd: 1(-0.7,0) 2(0.7,0)
  silkscreen extent -1.27,-0.64 1.27,0.64, body extent -0.83,-0.38 0.82,0.38, height 0.6
C0603 [mm]
  rect 0.8x0.9 smd: 1(-0.7,0) 2(0.7,0)
  silkscreen extent -1.27,-0.59 1.27,0.59, body extent -0.83,-0.38 0.82,0.38, height 0.6
C0805 [mm]
  rect 1.41x1.35 smd paste-100 mask+0.051: 1(0,0) 2(2,0)
  silkscreen extent -0.96,-0.9 2.96,0.9, body extent -0.51,-0.51 2.54,0.51, height 0.6
CAP-TH_10X20 [mm]
  round 1.6 hole 1: 1(-2.54,0) 2(2.54,0)
  silkscreen extent -5.08,-22.5 5.08,-0.89
CRYSTAL-SMD_4P-L3.2-W2.5-BL [mm]
  rect 1.4x1.2 smd: 1(-1.1,-0.85) 2(1.1,-0.85) 3(1.1,0.85) 4(-1.1,0.85)
  silkscreen extent -2.26,-1.91 2.03,1.68
DFN5×6 [mm]
  oval 2.646x2.73 smd: 1(0,0)
  rect 0.5x0.9 smd paste-100 mask+0.05: 2(1.905,-3.55) 3(-1.905,-3.55) 3(-0.635,-3.55) 3(0.635,-3.55)
  Top Layer region: -2.205,-1.875 2.205,-1.875 2.205,2.675 1.605,2.675 1.605,1.875 0.935,1.875 0.935,2.675 0.335,2.675 0.335,1.875 -0.335,1.875 -0.335,2.675 -0.935,2.675 -0.935,1.875 -1.605,1.875 -1.605,2.675 -2.205,2.675 -2.205,-1.875
  silkscreen extent -2.75,-4.23 2.66,2.28, body extent -2.03,-3.05 2.03,1.91, height 1.2
ESOP-8 [mm]
  oval 0.63x1.865 smd: 1(0,0) 2(1.27,0) 3(2.54,0) 4(3.81,0) 5(3.81,5.365) 6(2.54,5.365) 7(1.27,5.365) 8(0,5.365)
  rect 3.15x2.26 smd paste+0 mask+0.05: 9(1.905,2.682)
  silkscreen extent -0.92,-0.15 4.48,4.2
HDR-TH_4P-P1.27-V-M [mm]
  rect 1x1 hole 0.6: 1(-1.905,0)
  round 1 hole 0.6: 2(-0.635,0) 3(0.635,0) 4(1.905,0)
  silkscreen extent -2.54,-1 2.54,1
HDR-TH_9P-P2.00-V-M [mm]
  rect 1.5x1.5 hole 0.8: 1(-8,0)
  round 1.5 hole 0.8: 2(-6,0) 3(-4,0) 4(-2,0) 5(0,0) 6(2,0) 7(4,0) 8(6,0) 9(8,0)
  silkscreen extent -9.16,-1.14 9.16,1.14
Hole-2.2MM [mm]
  round 3.5 hole 2.2: 1(0,0)
Hole-3MM#1 [mm]
  round 3.5 hole 2.5: 1(-0.356,0)
Hole-3MM#2 [mm]
  round 3.5 hole 2.5: 1(0,0)
HVSON8 [mm]
  rect 0.3x0.6 smd paste+0 mask+0.05: 1(-0.975,-1.4) 2(-0.325,-1.4) 3(0.325,-1.4) 4(0.975,-1.4) 5(0.975,1.4) 6(0.325,1.4) 7(-0.325,1.4) 8(-0.975,1.4)
  rect 2.3x1.5 smd paste+0 mask+0.05: 9(0,0)
  silkscreen extent -1.5,-2.16 1.5,1.5, body extent -1.52,-1.52 1.52,1.52, height 0.8
L0603 [mm]
  rect 0.8x0.864 smd paste-100 mask+0.051: 1(-0.7,0) 2(0.7,0)
  silkscreen extent -1.26,-0.58 1.26,0.58
LED0603-FD [mm]
  rect 0.9x1 smd: 1(-0.85,0) 2(0.85,0)
  silkscreen extent -1.55,-0.75 1.75,0.75
LQFP-48_L7.0-W7.0-P0.50-LS9.0-BL [mm]
  oval 0.27x1.5 smd paste+0 mask+0.05: 1(-2.75,-4.25) 2(-2.25,-4.25) 3(-1.75,-4.25) 4(-1.25,-4.25) 5(-0.75,-4.25) 6(-0.25,-4.25) 7(0.25,-4.25) 8(0.75,-4.25) 9(1.25,-4.25) 10(1.75,-4.25) 11(2.25,-4.25) 12(2.75,-4.25) 25(2.75,4.25) 26(2.25,4.25) 27(1.75,4.25) 28(1.25,4.25) 29(0.75,4.25) 30(0.25,4.25) 31(-0.25,4.25) 32(-0.75,4.25) 33(-1.25,4.25) 34(-1.75,4.25) 35(-2.25,4.25) 36(-2.75,4.25)
  oval 1.5x0.27 smd paste+0 mask+0.05: 13(4.25,-2.75) 14(4.25,-2.25) 15(4.25,-1.75) 16(4.25,-1.25) 17(4.25,-0.75) 18(4.25,-0.25) 19(4.25,0.25) 20(4.25,0.75) 21(4.25,1.25) 22(4.25,1.75) 23(4.25,2.25) 24(4.25,2.75) 37(-4.25,2.75) 38(-4.25,2.25) 39(-4.25,1.75) 40(-4.25,1.25) 41(-4.25,0.75) 42(-4.25,0.25) 43(-4.25,-0.25) 44(-4.25,-0.75) 45(-4.25,-1.25) 46(-4.25,-1.75) 47(-4.25,-2.25) 48(-4.25,-2.75)
  silkscreen extent -3.59,-4.46 3.3,3.34
MSOP8 [mil]
  rect 15.98x55 smd: 1(-48.39,-85.55) 2(-22.8,-85.55) 3(2.8,-85.55) 4(28.39,-85.55) 5(28.39,95.55) 6(2.8,95.55) 7(-22.8,95.55) 8(-48.39,95.55)
  silkscreen extent -80,-86 49,56
R0603 [mm]
  rect 0.806x0.864 smd paste-100 mask+0.051: 1(-0.753,0) 2(0.753,0)
  silkscreen extent -1.25,-0.5 1.25,0.5, body extent -0.88,-0.38 0.9,0.38, height 1
R2512 [mm]
  rect 2x3.3 smd: 1(0,0) 2(6.133,0)
  silkscreen extent -1.16,-1.91 7.3,2.01, body extent -0.38,-1.52 6.48,1.52, height 1
SIP-2-1.27 [mm]
  rect 0.8x0.9 hole 0.5: 1(0,0)
  oval 0.8x0.9 hole 0.5: 2(1.27,0)
  silkscreen extent -0.64,-0.64 1.91,0.64
SMA [mm]
  rect 2x2 smd: 1(0,0) 2(4.4,0)
  silkscreen extent -0.4,-1.43 4.8,1.43, body extent 0.13,-1.27 4.32,1.27, height 1.5
SMD3×3×1.3 [mm]
  rect 1.3x2.72 smd: 1(2.7,0) 2(0,0)
  silkscreen extent -0.23,-1.58 2.93,1.58, body extent -0.13,-1.4 2.79,1.52, height 1.3
SOD-323_L1.6-W1.3-LS2.7-RD [mm]
  rect 0.9x0.7 smd paste+0 mask+0.05: 1(-1.3,0) 2(1.3,0)
  silkscreen extent -1.32,-1.02 1.02,1.02
SOD-523 [mm]
  rect 0.93x0.36 smd: 1(0,0) 2(1.27,0)
  silkscreen extent -0.04,-0.55 1.55,0.55, body extent 0,-0.38 1.27,0.38, height 0.8
SOP-8_L4.9-W3.9-P1.27-LS6.0-BL [mm]
  oval 0.63x1.865 smd: 1(-1.905,-2.682) 2(-0.635,-2.682) 3(0.635,-2.682) 4(1.905,-2.682) 5(1.905,2.682) 6(0.635,2.682) 7(-0.635,2.682) 8(-1.905,2.682)
  silkscreen extent -2.5,-1.5 2.5,1.48
SOT-23-3_L3.0-W1.7-P0.95-LS2.9-BR [mm]
  rect 1.037x0.532 smd: 1(1.101,-0.95) 2(1.101,0.95) 3(-1.101,0)
  silkscreen extent -0.86,-1.53 0.86,1.53
SOT-23-5 [mm]
  rect 1.1x0.6 smd: 1(0,0) 2(0,0.95) 3(0,1.902)
  rect 1.1x0.7 smd: 4(-2.588,1.902) 5(-2.588,0.002)
  silkscreen extent -2.26,-0.7 0.23,2.56
test [mm]
  round 1.2 smd: 1(0,0)
  silkscreen extent -0.8,-0.8 0.8,0.8
TSOT-23-6_L2.9-W1.6-P0.95-LS2.8-BL [mm]
  rect 0.55x1.2 smd: 1(-0.95,-1.2) 2(0,-1.2) 3(0.95,-1.2) 4(0.95,1.2) 5(0,1.2) 6(-0.95,1.2)
  silkscreen extent -1.5,-2.25 1.5,0.8

## Part data
A B C T1 T2 V+ V-: "THT Test Point"
C1 C7 C8 C9 C10 C11 C12 C13 C14 C15 C16 C17 C18 C19 C20 C21 C22 C24 C25 C30 C32 C34 C36 C38 C40 C41: library part "Cap Semi", "Capacitor (Semiconductor SIM Model)", LatestRevisionDate=29-May-2009, LatestRevisionNote="IPC-7351 Footprint Added.", PackageDescription="Chip Capacitor", PackageReference=C1206, Published=8-Jun-2000, Publisher="Altium Limited"
C2 C3 C6: library part Cap, "Capacitor", LatestRevisionDate=17-Jul-2002, LatestRevisionNote="Re-released for DXP Platform.", Published=8-Jun-2000, Publisher="Altium Limited"
C4 C5: library part LKME1252A101MF, Equivalent Series Resistance(ESR)=-, JLCPCB Part Class="Extended Part", LCSC Part Name="100uF ±20% 100V", Manufacturer=Ymin(永铭, Tolerance=±20%, Voltage Rating=100V, Add into BOM=yes, Convert to PCB=yes, Device=LKME1252A101MF, Diameter=10mm, Height - Seated (Max)=12.5mm, Lifetime=10000hrs@105℃, Manufacturer Part=LKME1252A101MF, Pin Spacing=5mm, Ripple Current=-, Supplier=LCSC, Supplier Footprint=插件,D10xL12.5m, Supplier Part=C443137, Symbol=LKME1252A101MF
C23 C26 C27 C28 C29 C37 C39 C42 C43 C44 C46 C47 C52 C53: library part CAP, "Capacitor"
C45 C49 C51 C54 C55 C56 C59 C62 C63 C64 C65 C66 C67 C68: library part C
C48 C50 C57 C58 C60 C61: library part Cap
D2 D3 D4 D5 D6 D7 D8 D9 D10 D11 D12 D13 D14 D15 D16 D17 D18 D19 D20 D21 D22 D23 D24: library part 100HF100PV, "Diode"
D26: library part D2
J2: "Header, 4-Pin", LatestRevisionDate=17-Jul-2002, LatestRevisionNote="Re-released for DXP Platform.", Publisher="Altium Limited"
J3: "Header, 9-Pin", LatestRevisionDate=17-Jul-2002, LatestRevisionNote="Re-released for DXP Platform.", Publisher="Altium Limited"
J4: library part "Header 2", "Header, 2-Pin", LatestRevisionDate=17-Jul-2002, LatestRevisionNote="Re-released for DXP Platform.", Publisher="Altium Limited"
L1 L2: library part 1.0mH-TH-8*10, "WE-TI Inductor,Isat=0.30A,Rdc=1.67Ω,8*10", Manufacturer="Wurth Elektronik", Package=TH, Part Number=744772102
L3 L4: library part LMLCB2B1608-000B
LED1: library part LED3, "Typical SiC LED", LatestRevisionDate=17-Dec-2003, LatestRevisionNote="PCB Footprint replaced.", Published=8-Jun-2000, Publisher="Altium Limited"
Q1 Q2 Q3 Q4 Q5 Q6 Q7 Q8 Q9 Q10 Q11 Q12: library part MOSFET-N, "N-Channel MOSFET", LatestRevisionDate=17-Jul-2002, LatestRevisionNote="Re-released for DXP Platform.", PackageDescription="TO, Flat Index; 3 In-Line, Axial Leads; Body Dia. 4.6mm; Lead Dia. 0.5 mm (max)", PackageReference=E3, PackageVersion=1995/1996, Published=8-Jun-2000, Publisher="Altium Limited"
R1 R2 R3 R4 R5 R6 R7 R8 R9 R10 R11 R12 R13 R14 R15 R16 R17 R18 R19 R20 R21 R22 R23 R24 R25 R26 R27 R28 R29 R30 R31 R32 R33 R34 R35 R36 R37 R38 R39 R40 R41 R42 R43 R44 R45 R46 R47 R48 R49 R50 R51 R52 R53 R54 R55 R59 R60 R61 R62 R63 R64 R65 R66 R67 R68 R69 R70 R71 R72 R73 R74 R75 R76 R77 R78 R79 R80 R81 R82 R83 R84 R85 R86 R87 R88 R89 R90 R91 R92 R93 R94 R95 R96 R97 R98 R99 R100 R101 R102 R103 R104 R105 R106 R107 R108 R109 R110: library part R
Rs1 Rs2 Rs3: library part RES, "Resistor"
Rt1: library part "Res Semi", "Semiconductor Resistor", LatestRevisionDate=17-Jul-2002, LatestRevisionNote="Re-released for DXP Platform.", PackageReference=0603, Published=8-Jun-2000, Publisher="Altium Limited"
U1: Input Voltage=4.5V~100V, JLCPCB Part Class="Extended Part", LCSC Part Name=4.5V-100V输入、0.6A输出、高效率同步, Manufacturer=SCT(芯洲科, Operating Temperature=-40¡æ~+125¡, Output Current=600mA, Output Voltage=800mV~24V, Quiescent Current (Iq)=100uA, Switching Frequency=300kHz~800kHz, Add into BOM=yes, Convert to PCB=yes, Datasheet=https://atta.szlcsc.com/upload/public/pdf/source/20211112/E759373F9DDE31F3483D2329670A01AA.pdf, Device=SCT2A10ASTER, Function=降压, Manufacturer Part=SCT2A10ASTER, Number of Outputs=1, output type=¹Ì¶, Supplier=LCSC, Supplier Footprint=ESOP-8, Supplier Part=C2916528, Switch tube (built-in/external)=ÄÚÖ, Symbol=SCT2A10ASTER, Synchronous Rectification=是, Topology=降压
U2: library part LMR14006
U3 U5 U6: JLCPCB Part Class="Extended Part", LCSC Part Name=单相高低侧功率MOSFET/IG, Manufacturer=WXNSIC(国硅集, Operating Temperature=-40¡æ~+125¡, Add into BOM=yes, Convert to PCB=yes, Datasheet=https://item.szlcsc.com/datasheet/G2022/43233047.html, Device=G2022, Fall Time=40ns, Load Type=MOSFET；IGBT, Manufacturer Part=G2022, Supplier=LCSC, Supplier Footprint=SOP-8, Supplier Part=C41414475, Symbol=G2022
U7 U9: Input Offset Voltage Drift (Vos TC)=2.7uV/℃, JLCPCB Part Class="Extended Part", Manufacturer=HGC(深圳汉, Maximum Power Supply Range (Vdd-Vss)=5.5V, Operating Temperature=-40¡æ~+125¡, Voltage - Input Offset(Vos)=3.5mV, Add into BOM=yes, Common Mode Rejection Ratio (CMRR)=68dB, Convert to PCB=yes, Datasheet=https://atta.szlcsc.com/upload/public/pdf/source/20221021/F6AADBCE20DACD6F9829379C38E8D4E4.pdf, Device=LMV358IDGKRG, Gain Bandwidth Product(GBP)=1MHz, LCSC Part Name=LMV358IDGKRG, Manufacturer Part=LMV358IDGKRG, Noise density(eN)=20nV/√Hz@10kHz, Number of Circuits=Ë«Â, Rail to Rail=轨到轨, Slew Rate(SR)=0.6V/us, Supplier=LCSC, Supplier Footprint=MSOP-8L, Supplier Part=C5145253, Symbol=LMV358IDGKRG
U8 U12: library part 74LVC2G14GV,125, JLCPCB Part Class="Extended Part", LCSC Part Name=双路施密特´, Manufacturer=Nexperia(安世, Sink Current=32mA, Supply Current (Max)=4uA, Supply Voltage(Single)=1.65V~5.5V, Add into BOM=yes, Convert to PCB=yes, Datasheet=https://atta.szlcsc.com/upload/public/pdf/source/20190910/C426708_2EB9B025A356EF78E3873476A80EEF6F.pdf, Device=74LVC2G14GV,125, High level range (VIH)=1.5V~3.6V, Input type=Ê©ÃÜÌØ´, Low level range (VIL)=250mV~1.2V, Manufacturer Part=74LVC2G14GV,125, Max Propagation Delay=4.3ns@5V,50pF, Number of Circuits=2, Series=74LVCÏµÁ, Source Current=32mA, Supplier=LCSC, Supplier Footprint=TSOP-6-1.5mm, Supplier Part=C426708, Symbol=74LVC2G14GV,125
U10: library part SN74LVC1G08DBVR(UMW), JLCPCB Part Class="Extended Part", LCSC Part Name=门极和·, Manufacturer=UMW(友台半µ, Operating Temperature=-40¡æ~+105¡, Quiescent Current (Max)=10uA, Sink Current=32mA, Supply Voltage=1.65V~5.5V, Add into BOM=yes, Convert to PCB=yes, Datasheet=https://atta.szlcsc.com/upload/public/pdf/source/20241113/984F0765BD3116AA5844B02C7C0EC901.pdf, Device=SN74LVC1G08DBVR(UMW), High level range (VIH)=1.7V, Logic Gate Type=ÓëÃ, Manufacturer Part=SN74LVC1G08DBVR(UMW), Number of Channels=1, Propagation Delay Time=10ns@5V,15pF, Series=74LVCÏµÁ, Source Current=32mA, Supplier=LCSC, Supplier Footprint=SOT-23-5, Supplier Part=C434068, Symbol=SN74LVC1G08DBVR_C434068
U11: library part SIT1042T, JLCPCB Part Class="Extended Part", Contributor=LCSC, Manufacturer Part=SIT1042T, spicePre=U, spiceSymbolName=SIT1042T, Supplier=LCSC, Supplier Part=C1121843
X1: library part xtal

## Free pads (board coordinates)
  round 2.8 hole 2.8: Z(0,0) Z(0,34.5) Z(31,0) Z(31,34.5)

## Via types
v1: diameter 0.45, hole 0.3, Top Layer to Bottom Layer, 450 vias
v2: diameter 0.45, hole 0.25, Top Layer to Bottom Layer, 425 vias

## Nets (pads, with @x,y where several pads share a name; then routed paths per layer and width w, separated by ;. In a path a pad name is that pad's centre, name@x,y a point inside that pad or via, vN(x,y) a via of type N, cw(c..) or ccw(c..) an arc to the next point about the centre after c; other vN are vias at no path point)
1.65V: C48.1 C51.1 C57.1 C58.1 R76.1 R94.1 R95.1 U7.6 U7.7 | length 25.2
  Bottom Layer w0.3: U7.6@-0.724,10.104 U7.7@-0.724,10.754 1.019,10.754 1.154,10.754 ; R95.1@6.31,1.62 6.3,1.61 C58.1@5.6,1.61 5.19,1.61 4.72,2.08 C57.1@4.67,2.08 R94.1@4.67,2.88 4.67,3.24 4.31,3.6 3.245,3.6 1.019,5.826 1.019,10.619 1.154,10.754 ; R76.1@6.8,11.89 6,11.89 5.9,11.99 5.9,12.31 5.08,13.13 5.08,13.81 4.15,14.74 3.575,14.74 2.215,13.38 2.215,12.561 2.203,12.549 C51.1@2.203,12.461 2.203,11.803 1.154,10.754
3V3: C20.2 C21.2 C24.1 C25.1 C26.1 C27.1 C56.1 C59.1 C63.1 C64.1 C65.1 C67.1 D21.2 D22.2 D23.2 D24.2 J2.1 L3.1 R1.2 R49.1 R55.2 R69.2 R80.2 R84.2 R87.1 R96.1 U4.1 U4.24 U4.36 U4.48 U8.5 U10.5 U11.3 U12.5 | length 109.3
  Top Layer w0.27: R96.1@-19.45,9.52 R96.1@-19.48,9.49 -19.485,9.485 -19.485,8.965 v2(-19.49,8.96) -18.9,8.96 -18.4,8.46 -18.4,7.45 -18.1,7.15 -17.211,7.15 U12.5@-17.188,7.127 -17.187,7.129 -15.991,7.129 -15.99,7.13 C65.1@-15.98,7.13 C65.1@-15.894,7.216 ; v1@-15.894,8.186 -15.86,8.22 v1(-15.86,8.28) ; v1(-13.89,28.41) -13.89,29.449 -12.746,30.592 -12.746,30.888 -12.682,30.952 -12.766,31.036 -12.766,31.356 v1(-12.8,31.39) ; -10.004,21.27 -9.96,21.226 -9.96,21.14 C56.1@-9.96,19.83 -9.96,18.7 U10.5@-9.94,18.68 ; R55.2@3.88,30.32 3.88,31.68 J2.1@4.12,31.92
  Top Layer w0.4: v2@-10.36,9.078 v2(-10.36,9.1) ; -3.044,19.2 -2.914,19.33 -0.43,19.33 C67.1@-0.21,19.33 ; L3.1@-0.43,18.28 C67.1@-0.43,19.16
  Top Layer w0.7: v1(-14.08,27.15) -13.89,26.96 -13.89,23.78 v1(-13.23,23.12) -13.211,23.101 -13.211,21.901 -12.45,21.14 -9.96,21.14 -9.51,21.14 v2(-8.65,21.14) -3.87,21.14 -3.044,20.314 -3.044,19.2 -3.044,16.762 v1(-1.9,15.618) ; v1@-1.9,15.54 -1.9,14.38 v1(-1.866,14.346)
  S2 w0.3: v1(-12.8,31.39) -2.69,31.39 -2.19,30.89 3.09,30.89 J2.1@4.12,31.92
  S2 w0.5: v1(-15.874,9.457) -15.874,8.864 -15.86,8.85 v1(-15.86,7.71) ; v1(-13.23,21.97) v1(-13.23,22.54) v1(-13.23,23.12) v1@-13.23,23.14
  S2 w0.7: v1(-15.874,9.457) -15.874,9.626 -17.84,11.592 v1(-17.84,20.51) v1(-17.84,21.71) -16.41,23.14 v1@-13.23,23.14
  Bottom Layer w0.27: v2(-19.49,8.96) -19.49,9.472 R87.1@-19.475,9.487 ; C24.1@-17.863,21.14 -17.863,20.183 -17.545,19.865 U4.24@-17.545,19.207 ; C24.1@-17.86,21.14 -17.84,21.16 v1(-17.84,21.71) ; U8.5@-17.188,7.127 -17.18,7.119 C59.1@-15.975,7.119 -15.894,7.2 -15.894,7.682 -15.86,7.716 -15.86,8.274 -15.866,8.28 -15.855,8.291 -15.855,8.839 -15.866,8.85 -15.866,9.449 v1(-15.874,9.457) ; v1@-13.89,28.37 -13.89,28.02 R1.2@-13.37,28.02 ; U4.36@-10.545,20.707 -10.545,21.16 v2(-9.51,21.16) -9.476,21.126 -9.09,21.126 -8.992,21.028 -8.877,21.143 v2@-8.696,21.143 ; C21.2@-10.019,10.925 -9.904,10.81 C21.2@-9.854,10.81 ; C27.1@-9.854,8.905 C26.1@-9.854,10.048 C21.2@-9.854,10.81 ; -7.12,12.6 -7.12,13.25 C20.2@-7.22,13.35 -7.228,13.358 -8.081,13.358 -8.43,13.707 U4.48@-9.045,13.707 -9.045,12.945 -9.783,12.207 U4.1@-10.545,12.207 -10.545,11.592 -10.202,11.592 -10.16,11.55 -10.14,11.55 -9.9,11.31 -9.9,10.856 C21.2@-9.854,10.81
  Bottom Layer w0.3: R80.2@-16.76,11.01 -16.76,10.371 -15.874,9.485 v1(-15.874,9.457) ; v1@-15.86,9.471 -15.819,9.471 -15.746,9.398 R49.1@-15.042,9.398 ; U11.3@-14.801,23.988 -13.827,23.988 C64.1@-13.791,24.024 C63.1@-12.902,24.024 -13.23,23.696 v1(-13.23,23.12) v1(-13.23,22.54) v1(-13.23,21.97) ; -7.12,12.6 -6.93,12.41 -6.93,11.91 D24.2@-6.94,11.9 -6.933,11.893 D21.2@-6.933,10.764 ; D22.2@-1.68,14.852 D22.2@-1.677,14.855
  Bottom Layer w0.5: v1(-1.9,15.618) -1.753,15.471 D22.2@-1.753,14.925 ; v1(-1.866,14.346) -1.68,14.16 D23.2@-1.68,13.45 ; v1@-1.68,14.39 D22.2@-1.68,14.852
  other v1: -15.85,8.85 -10.89,9.35 -10.94,10.01 -10.95,10.66 -14.64,27.35 -13.93,27.79 -14.63,27.92 -14.47,28.46
  other v2: -10.35,9.92
3V3A: C22.1 C45.1 C49.1 C55.1 C68.1 L3.2 R62.1 R63.1 R72.1 U4.9 U7.8 U9.8 | length 40.7
  Top Layer w0.4: v1(-0.846,15.85) -0.837,15.86 -0.423,15.86 ; L3.2@-0.43,16.88 -0.43,16.08 C68.1@-0.21,15.86 ; -0.423,15.86 C68.1@-0.21,15.86 ; v1(0.16,6.81) v1(0.16,8.19) -0.563,8.913 -0.563,10.83 -0.477,10.916 -0.477,12.763 0.04,13.28 0.04,15.82 C68.1@0,15.86 C68.1@-0.21,15.86 ; v1@0.17,6.8 0.81,6.8 R62.1@0.85,6.76
  S1 w0.254: v2(-15.03,10.525) -13.595,11.96 -7.7,11.96 -6.376,13.284 -3.785,13.284 -2.057,15.012 -1.649,15.012 -0.846,15.815 v1(-0.846,15.85)
  S2 w0.254: v1(-3.93,7.02) -2.19,7.02 -1.02,8.19 v1(0.16,8.19)
  Bottom Layer w0.254: C22.1@-15.07,10.41 C22.1@-15.07,10.62 ; C22.1@-15.068,10.616 -15.03,10.616 -15.03,10.72 -14.545,11.205 U4.9@-14.545,12.207 ; C22.1@-15.042,10.538 v2(-15.03,10.525) ; R63.1@-4.49,7.01 -3.94,7.01 v1(-3.93,7.02)
  Bottom Layer w0.3: R72.1@-2.18,10.56 C49.1@-2.18,11.3 ; U9.8@-0.357,6.238 0.085,6.238 0.16,6.314 v1(0.16,6.81) ; v1@0.171,6.903 C55.1@0.171,7.541
  Bottom Layer w0.4: C49.1@-2.18,11.34 -2.119,11.401 -0.727,11.401 U7.8@-0.724,11.404
  Bottom Layer w0.5: U7.8@-0.575,11.53 -0.477,11.628 v2(-0.477,11.894) ; v2@-0.575,11.962 C45.1@-0.575,12.461
+12V: C2.1 C3.1 C19.1 C36.1 C40.1 D3.1 D11.1 D19.1 J3.5 R2.1 R4.1 U2.5 U3.1 U5.1 U6.1 | length 92.4
  Top Layer w0.3: R2.1@-8.04,28.46 -7.311,28.46 -6.931,28.08 v2(-6.89,28.08)
  Top Layer w0.5: 10.513,21.98 v1(10.38,22.62) 10.38,21.847 10.101,21.568 10.101,20.387 C19.1@10.082,20.368 10.076,20.362 10.076,18.85 U3.1@10.07,18.844 U3.1@10.687,18.844 ; v1(10.97,22.63) 10.97,22.15 11.04,22.08 D3.1@11.05,22.08 ; U5.1@22.77,19.225 22.775,19.23 23.005,19.23 23.06,19.285 23.06,20.56 C36.1@23.21,20.71 23.36,20.86 23.36,21.68 23.95,22.27 v1(24.62,22.27) ; U6.1@34.778,18.845 34.859,18.845 34.919,18.905 34.919,20.469 C40.1@35.06,20.61 35.06,21.12 35.84,21.9 v1(36.26,21.9) 37.352,21.9 D19.1@37.36,21.892
  S2 w0.5: J3.5@-20.776,20.113 J3.5@-20.487,20.113
  S2 w0.7: J3.5@-20.776,20.113 -19.857,20.113 -19.05,20.92 -19.05,22.86 -17.16,24.75 -10.57,24.75 -8.64,26.68 v2(-6.78,26.68) ; v1(-7.05,29.17) -7.05,28.24 v2(-6.89,28.08) -6.78,27.97 v2(-6.78,26.68) ; 10.38,24.82 v1(10.38,22.62) v1@10.96,22.62 ; v1@36.92,21.9 v1(36.26,21.9) 36.038,21.9 33.278,24.66 29.3,24.66 26.91,22.27 v1(24.62,22.27) 24.127,22.27 21.297,25.1 12.9,25.1 12.62,24.82 3.86,24.82 2,26.68 v2(-6.78,26.68)
  Bottom Layer w0.3: v1@-7.07,29.17 -7.07,28.558 -7.062,28.55 C3.1@-6.933,28.421
  Bottom Layer w0.5: U2.5@-8.27,28.55 C3.1@-7.062,28.55 ; C3.1@-6.933,28.421 -6.894,28.382 -6.894,27.597 C2.1@-6.744,27.447 -6.806,27.385 R4.1@-6.806,26.042
  other v1: 36.92,21.88 23.99,22.31
AGND: C22.2 C45.2 C47.1 C49.2 C50.1 C51.2 C55.2 C60.1 C61.1 C68.2 J4.1 L4.2 R77.2 U4.8 U7.4 U9.4 | length 52.4
  Top Layer w0.3: L4.2@0.94,16.88 L4.2@0.97,16.85 ; C68.2@0.97,15.89 C68.2@1,15.86
  Top Layer w0.4: C68.2@0.97,15.89 L4.2@0.97,16.85 ; C68.2@1,15.86 1,13.977 1.19,13.787 v2(1.19,11.941)
  S1 w0.3: v2(-14.022,10.525) -13.074,11.473 -7.498,11.473 -6.231,12.74 0.146,12.74 v2(0.425,12.461)
  S2 w0.3: v2(-14.022,10.525) v2@-14.013,10.525
  S2 w0.4: v1(-6.29,5.34) -6.29,5.35 -5.75,5.89 v1(-5.75,5.9) -5.736,5.9 -5.616,6.02 v1(-2.64,6.02) -1.87,6.02 v1(-0.84,7.05) ; v1(-3.14,5.6) -3.14,6.01
  Bottom Layer w0.3: C22.2@-14.07,10.41 C22.2@-14.07,10.51 ; U4.8@-14.045,12.207 -14.045,10.66 -14.07,10.635 C22.2@-14.07,10.51 ; v2(-14.022,10.525) -14.055,10.525 C22.2@-14.07,10.51 ; v1@-7.16,7.62 -7.131,7.591 -7.131,7.039 C47.1@-7.048,6.956 ; v1(-7.16,7.626) -5.401,9.385 -5.275,9.385 ; R77.2@-3.145,10.485 -3.193,10.437 -4.223,10.437 -5.275,9.385 ; R77.2@-3.145,10.555 C49.2@-3.145,11.375 ; v1(-0.84,7.05) -0.84,7.53 C55.2@-0.829,7.541 -0.876,7.588 -1.814,7.588 C60.1@-1.861,7.635 -1.861,8.114 v1(-2.037,8.29) -4.18,8.29 -5.275,9.385 ; v1(0.52,11.894) 0.491,11.923 0.491,12.395 v2(0.425,12.461) C51.2@1.203,12.461 ; v1(3.836,14.111) 4.175,13.771 4.175,13.4 C50.1@4.29,13.4 ; U7.4@3.876,9.454 2.714,9.454 1.753,8.493 C61.1@1.753,7.381 1.753,5.813 3.278,4.288 U9.4@4.243,4.288
  other v1: -2.56,3.23 -2.88,3.9 -3.64,6.02 1.753,6.597 -5.05,7.91 1.753,7.937 -5.8,8.46 -2.761,8.636 -1.5,8.66 2.411,9.062 1.91,9.52 0.39,9.809 -4.54,9.95 1.7,10.092
  other v2: 4.21,13.5
AH: R16.2 U4.29 | length 17.1
  S2 w0.27: v1(-14.04,21.92) -14.04,21.912 -12.654,20.526 -4.611,20.526 v1(-2.215,18.13)
  Bottom Layer w0.27: U4.29@-14.045,20.707 -14.045,21.915 v1(-14.04,21.92) ; v1(-2.215,18.13) -1.252,18.13 -0.957,17.835 0.118,17.835 R16.2@0.123,17.83
AL: R20.2 U4.26 | length 18.5
  S2 w0.27: v1(-15.54,19.22) -14.776,19.984 -4.937,19.984 -2.457,17.503 -2.249,17.503 v1(-2.215,17.469)
  Bottom Layer w0.27: v1@-15.545,19.424 U4.26@-15.545,20.707 ; v1(-2.215,17.469) -1.399,17.469 -0.911,16.981 0.078,16.981 R20.2@0.123,16.935
BH: R35.2 U4.30 | length 16.6
  S2 w0.27: v1(-13.7,18.97) -12.84,18.97 -12.46,18.59 -7.19,18.59 v1(-6.26,17.66)
  Bottom Layer w0.27: -13.545,19.174 U4.30@-13.545,20.707
  Bottom Layer w0.3: v1(-6.26,17.66) -3.73,17.66 -2.556,16.486 -0.592,16.486 -0.442,16.335 -0.222,16.335 0.073,16.041 R35.2@0.123,16.041
BL: R39.2 U4.27 | length 19.5
  S2 w0.27: v1(-15.06,18.72) -14.686,18.346 -13.166,18.346 -11.584,16.764 -9.384,16.764 -7.654,15.034 -5.495,15.034 -4.677,14.216 -2.864,14.216 -2.076,15.004 -1.656,15.004 -1.346,15.004 -1.262,15.088 -0.673,15.088 v1(-0.639,15.123)
  Bottom Layer w0.27: v1(-15.06,18.72) -15.06,18.769 -14.926,18.903 -14.926,19.474 -15.045,19.593 U4.27@-15.045,20.707 ; v1(-0.639,15.123) -0.627,15.134 0.111,15.134 R39.2@0.123,15.146
CA: C30.2 Q7.3 Q10.3 R73.1 R104.2 R108.2 Rs1.1 | length 23.8
  Top Layer w0.3: R104.2@11.31,11.8 11.31,11.85 11.41,11.95 11.46,11.95 11.75,12.24 13.101,12.24 v1(13.12,12.221) ; v1@13.12,12.24 v1@14.52,12.24 ; v1(18.29,10.68) 18.319,10.651 18.319,10.111 R108.2@18.35,10.08
  S2 w0.3: v1(8.552,8.829) 8.572,8.809 16.324,8.809 16.601,8.532 v2(16.642,8.532)
  Bottom Layer w0.3: R73.1@7.01,10.02 7.06,10.02 8.232,8.848 8.533,8.848 v1(8.552,8.829) ; v2(16.642,8.532) 17.618,8.532 Rs1.1@17.91,8.24
  Bottom Layer w1: 21.896,11.445 22.168,11.717 ccw(c20.372,13.513) 22.912,13.513 C30.2@22.912,19.254
  other v1: 19.15,8.839 19.94,8.839 20.79,8.839 21.22,9.42 20.34,9.48 19.54,9.56 16.625,9.948 19.99,10.19 21.65,10.19 20.81,10.28 19.24,10.43 16.36,10.68 22.04,10.98 16.27,11.45 16.22,12.03 13.75,12.21 14.52,12.2
  other v2: 17.56,7.009 18.27,7.009 19.11,7.009 19.94,7.009 20.91,7.009 18.61,9.66
CANH: D25.2 J3.1 R97.2 U11.7 | length 7.8
  Bottom Layer w0.27: J3.1@-20.776,28.113 -19.216,28.113 D25.2@-18.744,28.585 -18.491,28.585 -17.72,27.814 -17.72,26.45 -18.49,25.68 -18.49,24.849 -18.279,24.638 U11.7@-17.601,24.638
CANL: D25.1 J3.2 R97.1 U11.6 | length 6.8
  Bottom Layer w0.27: J3.2@-20.776,26.113 -20.443,26.113 -19.871,26.685 D25.1@-18.744,26.685 -18.83,26.599 -18.83,26.09 -19.23,25.69 -19.23,24.25 -18.91,23.93 -18.605,23.93 -18.49,23.815 R97.1@-18.49,23.81 ; R97.1@-18.49,23.899 -18.416,23.973 -17.616,23.973 U11.6@-17.601,23.988
CANRX: U4.45 U11.4 | length 11.7
  S1 w0.27: v1(-14.77,22) -14.77,21.782 -12.54,19.552 -12.54,16.66 v1(-11.55,15.67)
  Bottom Layer w0.27: U11.4@-14.8,23.338 -14.77,23.307 v1(-14.77,22) ; v1(-11.55,15.67) -10.521,15.67 -10.058,15.207 U4.45@-9.045,15.207
CANTX: U4.46 U11.1 | length 14.7
  S1 w0.27: v1(-14.79,25.74) -12.616,23.566 -12.616,21.187 -12.06,20.631 -12.06,17.32 -10.83,16.09 v1(-10.83,14.93)
  S2 w0.27: v1(-10.83,14.93) v1@-10.83,14.968
  Bottom Layer w0.27: U11.1@-14.801,25.288 -14.795,25.293 v1@-14.795,25.61 ; v1(-10.83,14.93) -10.781,14.93 -10.558,14.707 U4.46@-9.045,14.707
CB: C34.2 Q9.3 Q12.3 R93.1 R103.2 R109.2 Rs3.1 | length 39.3
  Top Layer w0.3: R103.2@26.41,12.06 26.832,12.06 v1(26.946,12.174) ; R103.2@26.46,12.13 R103.2@26.47,12.12 ; R109.2@31.38,10.69 31.431,10.741 31.861,10.741 v1(31.89,10.77)
  S2 w0.3: v2(6.561,4.1) 6.561,5.773 8.238,7.45 8.478,7.69 15.872,7.69 16.112,7.45 17.182,6.38 28.1,6.38 v2(29.11,7.39)
  Bottom Layer w0.3: v2(6.561,4.1) 6.581,4.081 6.581,3.619 R93.1@6.6,3.6 ; v2(29.11,7.39) 29.603,7.39 30.453,8.24 Rs3.1@30.453,8.3 30.02,8.3 v2(29.68,7.96)
  Bottom Layer w1: Q9.3@33.651,11.421 34.36,12.13 ccw(c32.564,13.926) 35.104,13.926 C34.2@35.104,19.889
  other v1: 32.15,7.71 32.76,7.72 28.67,8.17 27.12,8.19 27.94,8.32 32.15,8.32 32.73,8.39 26.66,8.71 27.38,8.71 29.11,8.69 28.36,8.9 31.87,8.91 32.52,8.98 33.15,9.19 28.02,9.44 28.9,9.44 32.15,9.53 32.77,9.74 33.5,9.79 28.01,10.18 32.27,10.21 28.9,10.29 33.15,10.42 34.01,10.48 28.86,10.94 28.05,10.96 28.89,11.6 28.88,12.18
  other v2: 31.74,7.29 31.2,7.34 30.62,7.35 29.92,7.47 30.84,7.92 30.23,7.94 31.5,7.95 31.25,8.57 30.59,8.59 29.89,8.62 30.36,9.34 31.21,9.33 29.71,9.44 30.12,9.89 31.57,9.95 30.9,9.98
CC: C32.2 Q8.3 Q11.3 R92.1 R102.2 R110.2 Rs2.1 | length 43.7
  Top Layer w0.3: R102.2@36.98,11.77 37.049,11.77 37.249,11.97 v1(37.29,11.97) ; R110.2@44.451,10.659 R110.2@44.39,10.72 R110.2@44.39,10.72 44.391,11.23 44.46,11.299 v1(44.46,11.34)
  S2 w0.3: v1(6.8,0.69) 7.19,1.08 7.19,5.681 8.449,6.94 8.689,7.18 15.661,7.18 15.901,6.94 16.971,5.87 31.92,5.87 33.389,7.339 34.111,7.339 34.23,7.22 40.76,7.22 v2(40.77,7.21)
  Bottom Layer w0.3: R92.1@6.27,0.69 v1(6.8,0.69) ; v2(40.77,7.21) 41.916,7.21 Rs2.1@42.126,7
  other v1: 40.99,4.95 42.15,4.93 43.27,4.95 40.12,5.04 44.38,5.04 39.34,5.07 45.26,5.34 43.89,5.6 40.83,5.69 40.06,5.7 44.66,5.7 39.24,5.81 45.95,6.07 44.28,6.21 43.56,6.27 40.07,6.34 40.8,6.33 44.89,6.35 39.26,6.51 44.43,6.79 43.76,6.95 46.98,7.58 40.04,7.81 40.64,7.9 39.27,7.93 39.14,8.58 39.82,8.58 40.53,8.59 46.99,8.59 42.72,9.01 39.73,9.25 42.02,9.26 40.45,9.29 39.01,9.3 41.23,9.31 46.96,9.43 46.95,10.26 45.02,10.85 46.9,11.1 45.12,12
  other v2: 42.26,5.68 43.08,5.67 41.47,5.71 41.58,6.37 42.85,6.42 42.26,6.52 43,7.09 41.58,7.17 42.29,7.18 43.27,7.64 41.55,7.85 42.27,7.83 42.56,8.39 43.23,8.43 41.91,8.51 41.22,8.58
CH: R52.2 U4.31 | length 19.8
  S2 w0.27: v1(-13.65,16.96) -12.459,16.96 -11.783,16.284 -9.583,16.284 -7.853,14.554 -5.694,14.554 -4.872,13.732 -1.589,13.732 -0.997,14.325 -0.673,14.325 v1(-0.639,14.359)
  Bottom Layer w0.27: v1(-13.65,16.96) -13.616,16.994 -13.319,16.994 -12.836,17.478 -12.836,18.104 -13.045,18.313 U4.31@-13.045,20.707 ; v1(-0.639,14.359) -0.605,14.325 0.049,14.325 R52.2@0.123,14.251
CL: R54.2 U4.28 | length 20.7
  S2 w0.27: v1(-13.698,15.626) -13.698,15.598 -11.51,13.41 -7.27,13.41 -7.08,13.22 -1.422,13.22 -0.968,13.675 -0.673,13.675 v1(-0.639,13.709)
  Bottom Layer w0.27: U4.28@-14.545,20.707 -14.545,19.786 -14.314,19.555 -14.314,18.144 -14.31,18.14 -14.31,16.095 -14.119,15.905 -14.025,15.905 -13.746,15.626 v1(-13.698,15.626) ; v1(-0.639,13.709) -0.59,13.709 -0.352,13.471 0.008,13.471 R54.2@0.123,13.356
GND: C2.2 C3.2 C6.2 C12.1 C14.1 C16.2 C17.2 C19.2 C20.1 C21.1 C24.2 C25.2 C26.2 C27.2 C28.2 C29.2 C36.2 C38.1 C39.1 C40.2 C41.1 C43.1 C44.1 C46.1 C52.1 C53.1 C54.2 C56.2 C59.2 C62.2 C63.2 C64.2 C65.2 C66.2 C67.2 D2.1 D7.1 D15.1 D20.1 D25.3 J2.4 J3.4 J3.6 L4.1 R6.1 R9.1 R10.2 R11.1 R33.2 R50.2 R59.2 R64.1 R65.1 R78.1 R79.1 R88.2 Rt1.1 U1.1 U1.9 U2.2 U3.4 U4.47 U5.4 U6.4 U8.2 U10.3 U11.2 U12.2 U12.3 X1.2 X1.4 | length 270.6
  Top Layer w0.27: C53.1@44.995,7.405 45.755,7.405 R79.1@45.99,7.17
  Top Layer w0.3: C66.2@-21.055,7.135 -21.051,7.131 -19.592,7.131 U12.2@-19.588,7.127 U12.3@-19.588,6.177 -19.263,6.177 -18.416,5.33 v1(-18.39,5.33) ; J3.6@-20.776,18.113 -20.605,18.284 -19.576,18.284 -19.183,18.677 ; J3.4@-20.776,22.113 -19.837,22.113 ; v1(-18.91,11.46) -18.91,12.8 -17.85,13.86 -17.85,17.344 -19.183,18.677 ; v1(-18.75,27.6) -18.93,27.42 -18.93,26.77 -18.72,26.56 -18.72,23.23 -19.837,22.113 ; v1(-15.98,5.37) C65.2@-15.98,6.13 ; v1(-15.51,18.2) -15.51,18.159 -15.37,18.019 -15.37,17.82 -15.27,17.72 R88.2@-15.22,17.72 ; v1(-12.91,25.76) -9.959,22.809 ; U10.3@-12.528,16.78 -12.528,14.968 -11.861,14.301 -8.279,14.301 -6.87,15.71 v1(-6.87,17.19) -6.87,17.38 -6.889,17.399 -6.889,17.921 -6.87,17.94 -6.87,18.57 v1(-7.64,19.34) -7.71,19.41 -7.76,19.41 -8.18,19.83 C56.2@-8.96,19.83 ; R59.2@6.73,30.33 6.78,30.33 7.796,31.346 7.796,31.786 J2.4@7.93,31.92 ; C43.1@8.876,12.89 R64.1@9.869,12.89 ; R64.1@10.289,12.89 R64.1@10.466,13.067 ; C44.1@21.19,12.82 21.24,12.82 21.34,12.92 21.34,13.28 21.44,13.38 R65.1@21.44,13.85 ; Rt1.1@22.97,12.81 22.97,12.86 23.42,13.31 23.698,13.31 D15.1@23.898,13.51 ; -19.837,22.113 -19.763,22.113 -18.79,21.14 -18.79,19.07 -19.183,18.677
  Top Layer w0.4: v2(0.743,23.18) 0.743,23.166 0.79,23.12 C67.2@0.79,19.33 0.79,18.43 L4.1@0.94,18.28 ; C46.1@0.838,3.96 2,3.96 4.02,1.94 v1(4.02,-0.31) ; C52.1@35.44,12.45 35.44,12.5 35.49,12.55 35.77,12.55 35.87,12.65 v1(35.92,12.65) ; C53.1@44.88,7.57 44.923,7.527 45.219,7.527 45.316,7.43 v2(45.33,7.43)
  Top Layer w0.5: U3.4@10.07,15.034 U3.4@10.406,15.034 ; U3.4@10.466,14.92 10.466,13.129 10.497,13.098 11.929,13.098 D7.1@11.96,13.129 ; R65.1@21.44,13.85 21.56,13.97 23.338,13.97 ; U5.4@22.77,15.415 23.02,15.415 23.08,15.355 23.08,14.228 23.338,13.97 ; D15.1@23.798,13.51 23.338,13.97 ; R78.1@34.54,12.95 35.44,12.95 ; C52.1@35.44,12.5 35.44,12.95 ; D20.1@35.78,12.95 35.44,12.95
  Top Layer w0.7: U3.4@10.406,15.034 11.084,15.034 11.97,15.92 11.97,19.11 11.532,19.548 11.532,20.318 C19.2@11.482,20.368 11.532,20.418 11.39,20.56 11.39,21.06 v2(11.7,21.06) v1(12.44,21.8) ; U5.4@22.77,15.415 22.805,15.45 24.38,15.45 25.44,16.51 25.44,19.83 C36.2@24.61,20.66 ; R78.1@34.42,12.9 34.47,12.9 34.52,12.95 34.52,15 U6.4@34.555,15.035 ; U6.4@34.778,15.035 34.813,15.07 35.76,15.07 37.179,16.489 37.179,18.783 36.693,19.269 36.641,19.269 36.39,19.52 v2(36.39,20.84)
  S1 w0.3: v1(-9.93,22.55) -9.93,29.268 -9.49,29.708 v1(-9.49,29.749)
  S2 w0.3: v1(-18.75,27.6) -18,28.35 v1(-15.9,28.35) -14.501,29.749 v1(-9.49,29.749) ; v1(2.43,28.25) 4.73,28.25 7.796,31.316 7.796,31.786 J2.4@7.93,31.92 ; v1(35.92,12.65) 36.766,12.65 36.82,12.704 41.396,12.704 45.33,8.77 v2(45.33,7.43)
  S2 w0.7: 0.933,23.72 1.59,23.72 7.63,23.72 10.23,21.12 11.81,21.12 v1@12.44,21.75 ; v1(12.44,21.8) 12.44,23.14 13.49,24.19 20.92,24.19 23.75,21.36 27.34,21.36 29.73,23.75 32.68,23.75 35.44,20.99 36.19,20.99 36.39,20.79 36.39,19.86 ; 24.59,21.29 24.59,20.61 v2(25.16,20.04)
  Bottom Layer w0.27: R50.2@-6.66,15.19 R50.2@-6.62,15.19
  Bottom Layer w0.3: C62.2@-21.055,7.119 -21.051,7.123 -19.592,7.123 U8.2@-19.588,7.127 -19.581,7.12 -18.62,7.12 -18.38,6.88 -18.38,5.34 v1(-18.39,5.33) ; J3.6@-20.776,18.113 -20.69,18.027 -19.096,18.027 R33.2@-19.01,17.94 ; J3.4@-20.776,22.113 -19.713,22.113 -19.08,21.48 -19.08,21.26 -18.98,21.16 C24.2@-18.93,21.16 ; C28.2@-19,20.05 -19,21.06 -18.99,21.07 -18.93,21.07 C24.2@-18.86,21.14 ; v1(-18.91,11.46) -18.87,11.46 -18.651,11.241 C54.2@-18.651,10.167 ; D25.3@-16.541,27.635 -16.289,27.635 -15.9,28.024 v1(-15.9,28.35) ; v1(-15.98,5.37) -15.978,5.373 -15.978,6.117 C59.2@-15.975,6.119 -14.63,6.119 C41.1@-14.299,6.45 ; C39.1@-15.042,8.625 -15.042,6.812 -14.73,6.5 C41.1@-14.299,6.5 C41.1@-14.299,6.45 ; U11.2@-14.801,24.638 -14.402,24.638 -14.016,25.024 C64.2@-13.791,25.024 C63.2@-12.902,25.024 -12.902,25.752 v1(-12.91,25.76) ; X1.2@-12.902,5.517 X1.2@-12.816,5.603 -13.073,5.86 -13.709,5.86 C41.1@-14.299,6.45 ; v1@-11.18,14.207 U4.47@-9.045,14.207 -7.32,14.207 -7.22,14.307 C20.1@-7.22,14.35 C20.1@-7.22,14.4 ; X1.4@-10.616,7.303 -10.427,7.492 C38.1@-9.092,7.492 -9.092,7.542 -8.42,8.214 C27.2@-8.42,8.826 ; v1(-9.93,22.55) -9.901,22.521 -9.901,22.23 -9.801,22.13 C29.2@-9.78,22.13 -9.704,22.054 -9.068,22.054 C25.2@-8.992,21.978 -8.992,22.028 -8.892,22.128 -8.633,22.128 -8.571,22.19 v2(-8.53,22.19) ; C21.1@-8.854,10.81 C26.2@-8.854,10.048 -8.804,10.048 -8.43,9.674 -8.43,8.929 C27.2@-8.454,8.905 -8.454,8.86 C27.2@-8.42,8.826 ; -8.451,21.849 -7.64,21.038 v1(-7.64,19.34) ; v1(-7.879,8.311) -7.879,8.43 -7.904,8.455 -8.054,8.455 -8.42,8.821 C27.2@-8.42,8.826 ; v1(-6.87,17.19) -6.87,17.18 -6.92,17.13 -6.92,15.9 -6.66,15.64 R50.2@-6.66,15.19 ; v1(2.43,28.25) 4.08,28.25 4.55,27.78 4.55,24.963 4.5,24.913 ; R11.1@4.108,19.62 4.108,22.218 4.45,22.56 4.5,22.56
  Bottom Layer w0.4: v1(3.81,-0.87) 3.82,-0.88 4.31,-0.88 4.36,-0.93 v1(4.374,-0.93) ; v1(3.83,-1.46) 3.844,-1.46 v1(4.374,-0.93) ; v1(4.02,-0.31) 4.02,-0.324 4.493,-0.796 4.493,-0.92 4.383,-0.92 v1(4.374,-0.93) ; v1(4.58,-1.49) 4.6,-1.47 4.6,-0.93 R9.1@5.27,-0.93 5.259,-0.941 5.259,-1.391 v1(5.19,-1.46)
  Bottom Layer w0.5: C6.2@-12.267,28.147 -11.889,28.525 -10.695,28.525 U2.2@-10.67,28.55 -10.645,28.525 -9.783,28.525 -9.49,28.818 v1(-9.49,29.749) -9.49,30.68 -9.803,30.993 ; R10.2@-10.481,31.193 -10.481,31.143 -10.331,30.993 -9.803,30.993 ; C3.2@-5.95,28.51 -5.9,28.51 -5.494,28.104 -5.494,27.597 C2.2@-5.344,27.447 -5.44,27.351 -5.44,26.211 C16.2@-5.536,26.115 C17.2@-4.266,26.115 -4.17,26.019 -3.066,26.019 D2.1@-2.996,25.949 ; D2.1@-2.996,25.923 D2.1@-2.996,25.949 ; R6.1@3.74,25.94 3.74,25.99 4.207,25.99 4.5,25.697 ; 4.5,22.56 4.5,24.129 ; 4.5,24.913 4.5,24.129 ; -9.803,30.993 -8.927,31.869 -5.09,31.869 -4.474,31.253 -2.833,31.253 C12.1@-2.456,30.876 -2.203,30.623 -2.203,27.76 -1.599,27.156 U1.1@-1.599,26.574 U1.1@-1.599,26.198 ; D2.1@-2.996,25.949 -2.996,26.068 -2.926,26.138 -1.659,26.138 U1.1@-1.599,26.198 ; U1.1@-1.599,26.198 -1.599,25.351 -0.139,23.891 U1.9@0.306,23.891 0.544,24.129 4.5,24.129